# Altium PCB Zotino.PCBDOC (part 1 of 10)
Units mm, origin at the board's own origin, x right, y up, seen from the top; angles counter-clockwise.
Board outline 160.1 x 100.1 mm, 4 copper layers (TopLayer, Internal Plane 2, Signal Layer 1, BottomLayer), stack 1.563 mm thick; 759 components, 378 nets, 2272 pads, 779 vias.
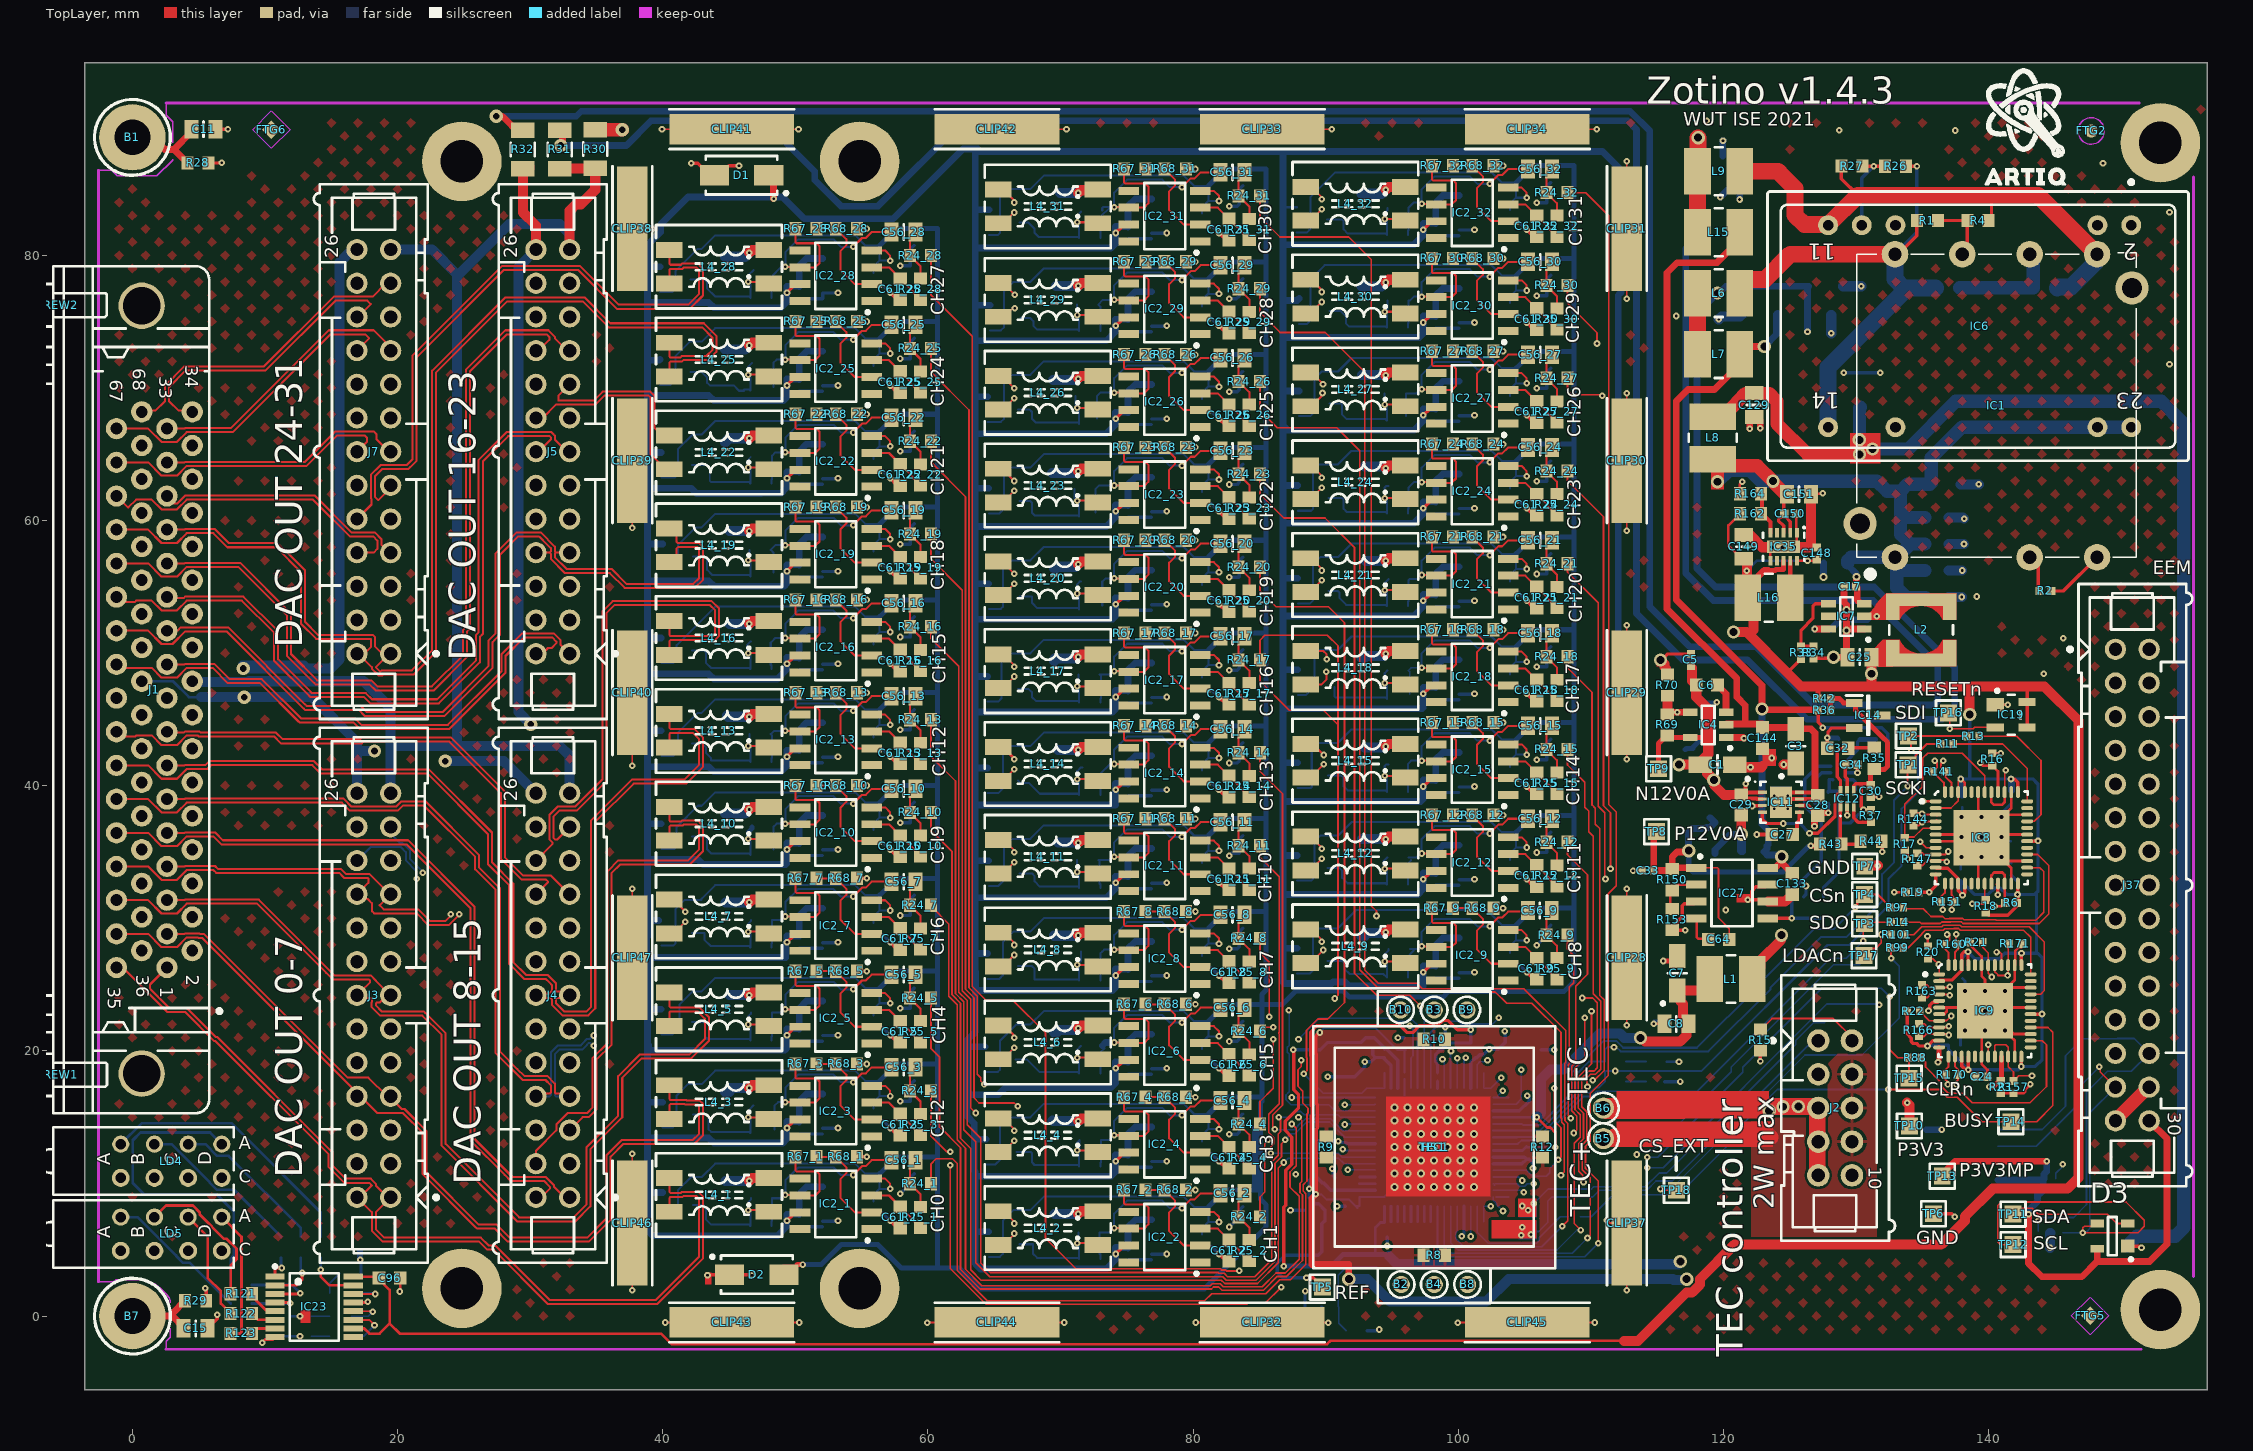
[diagram p0: TopLayer view]
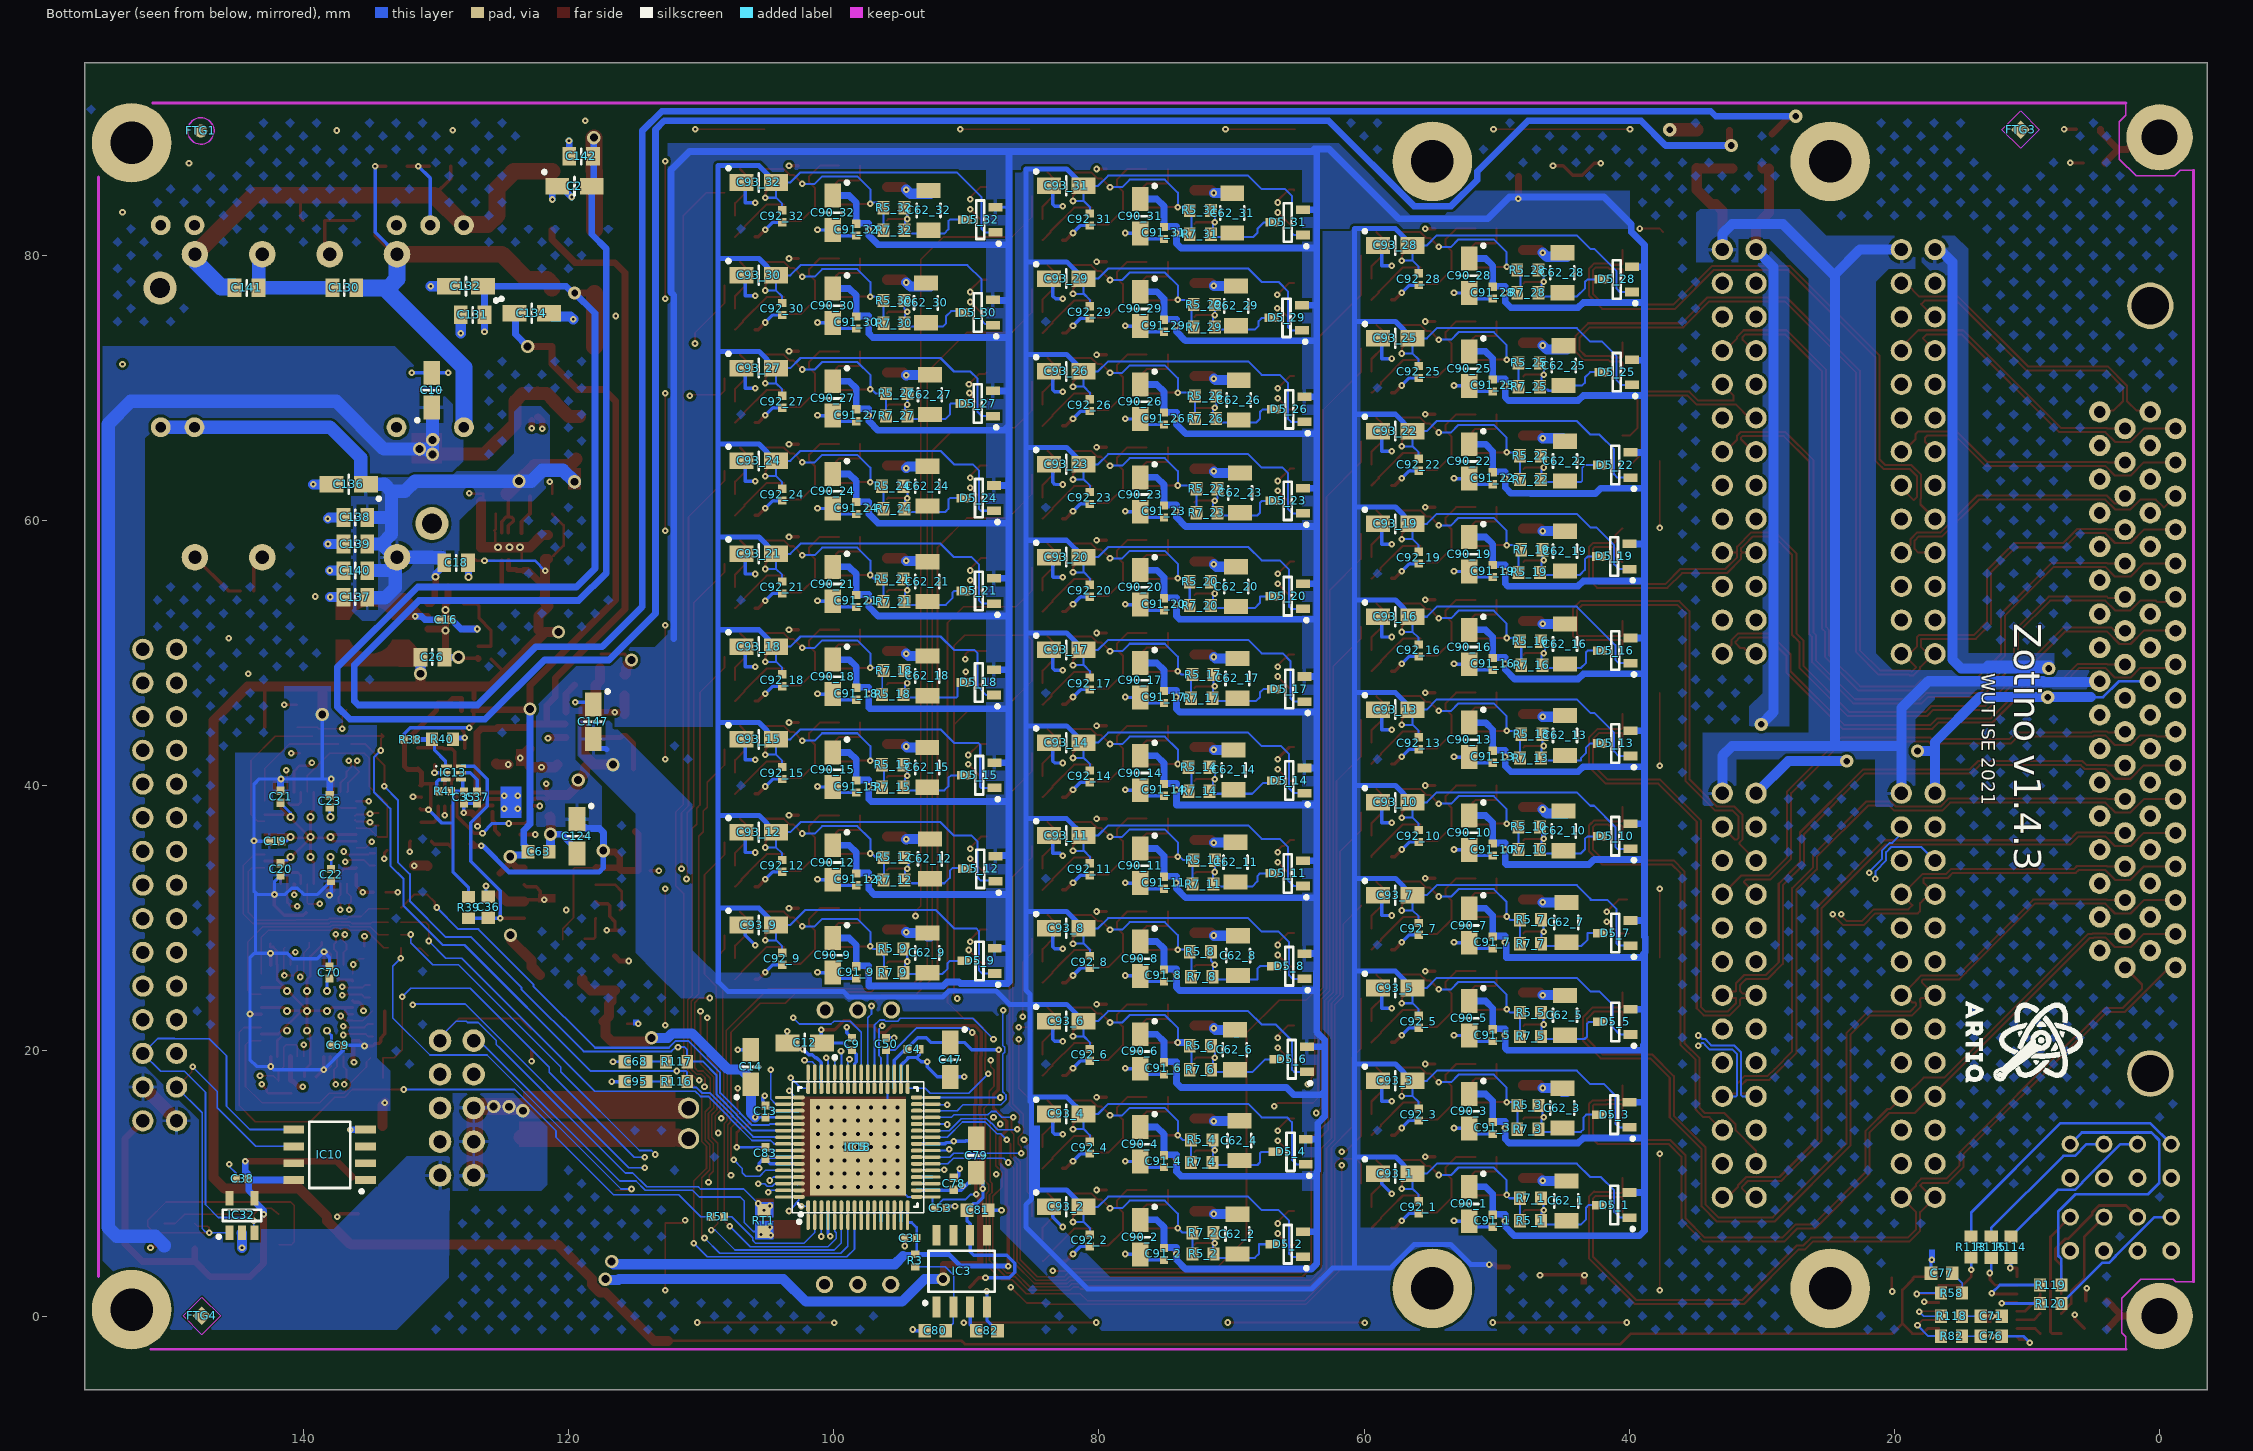
[diagram p1: BottomLayer view, seen from below]
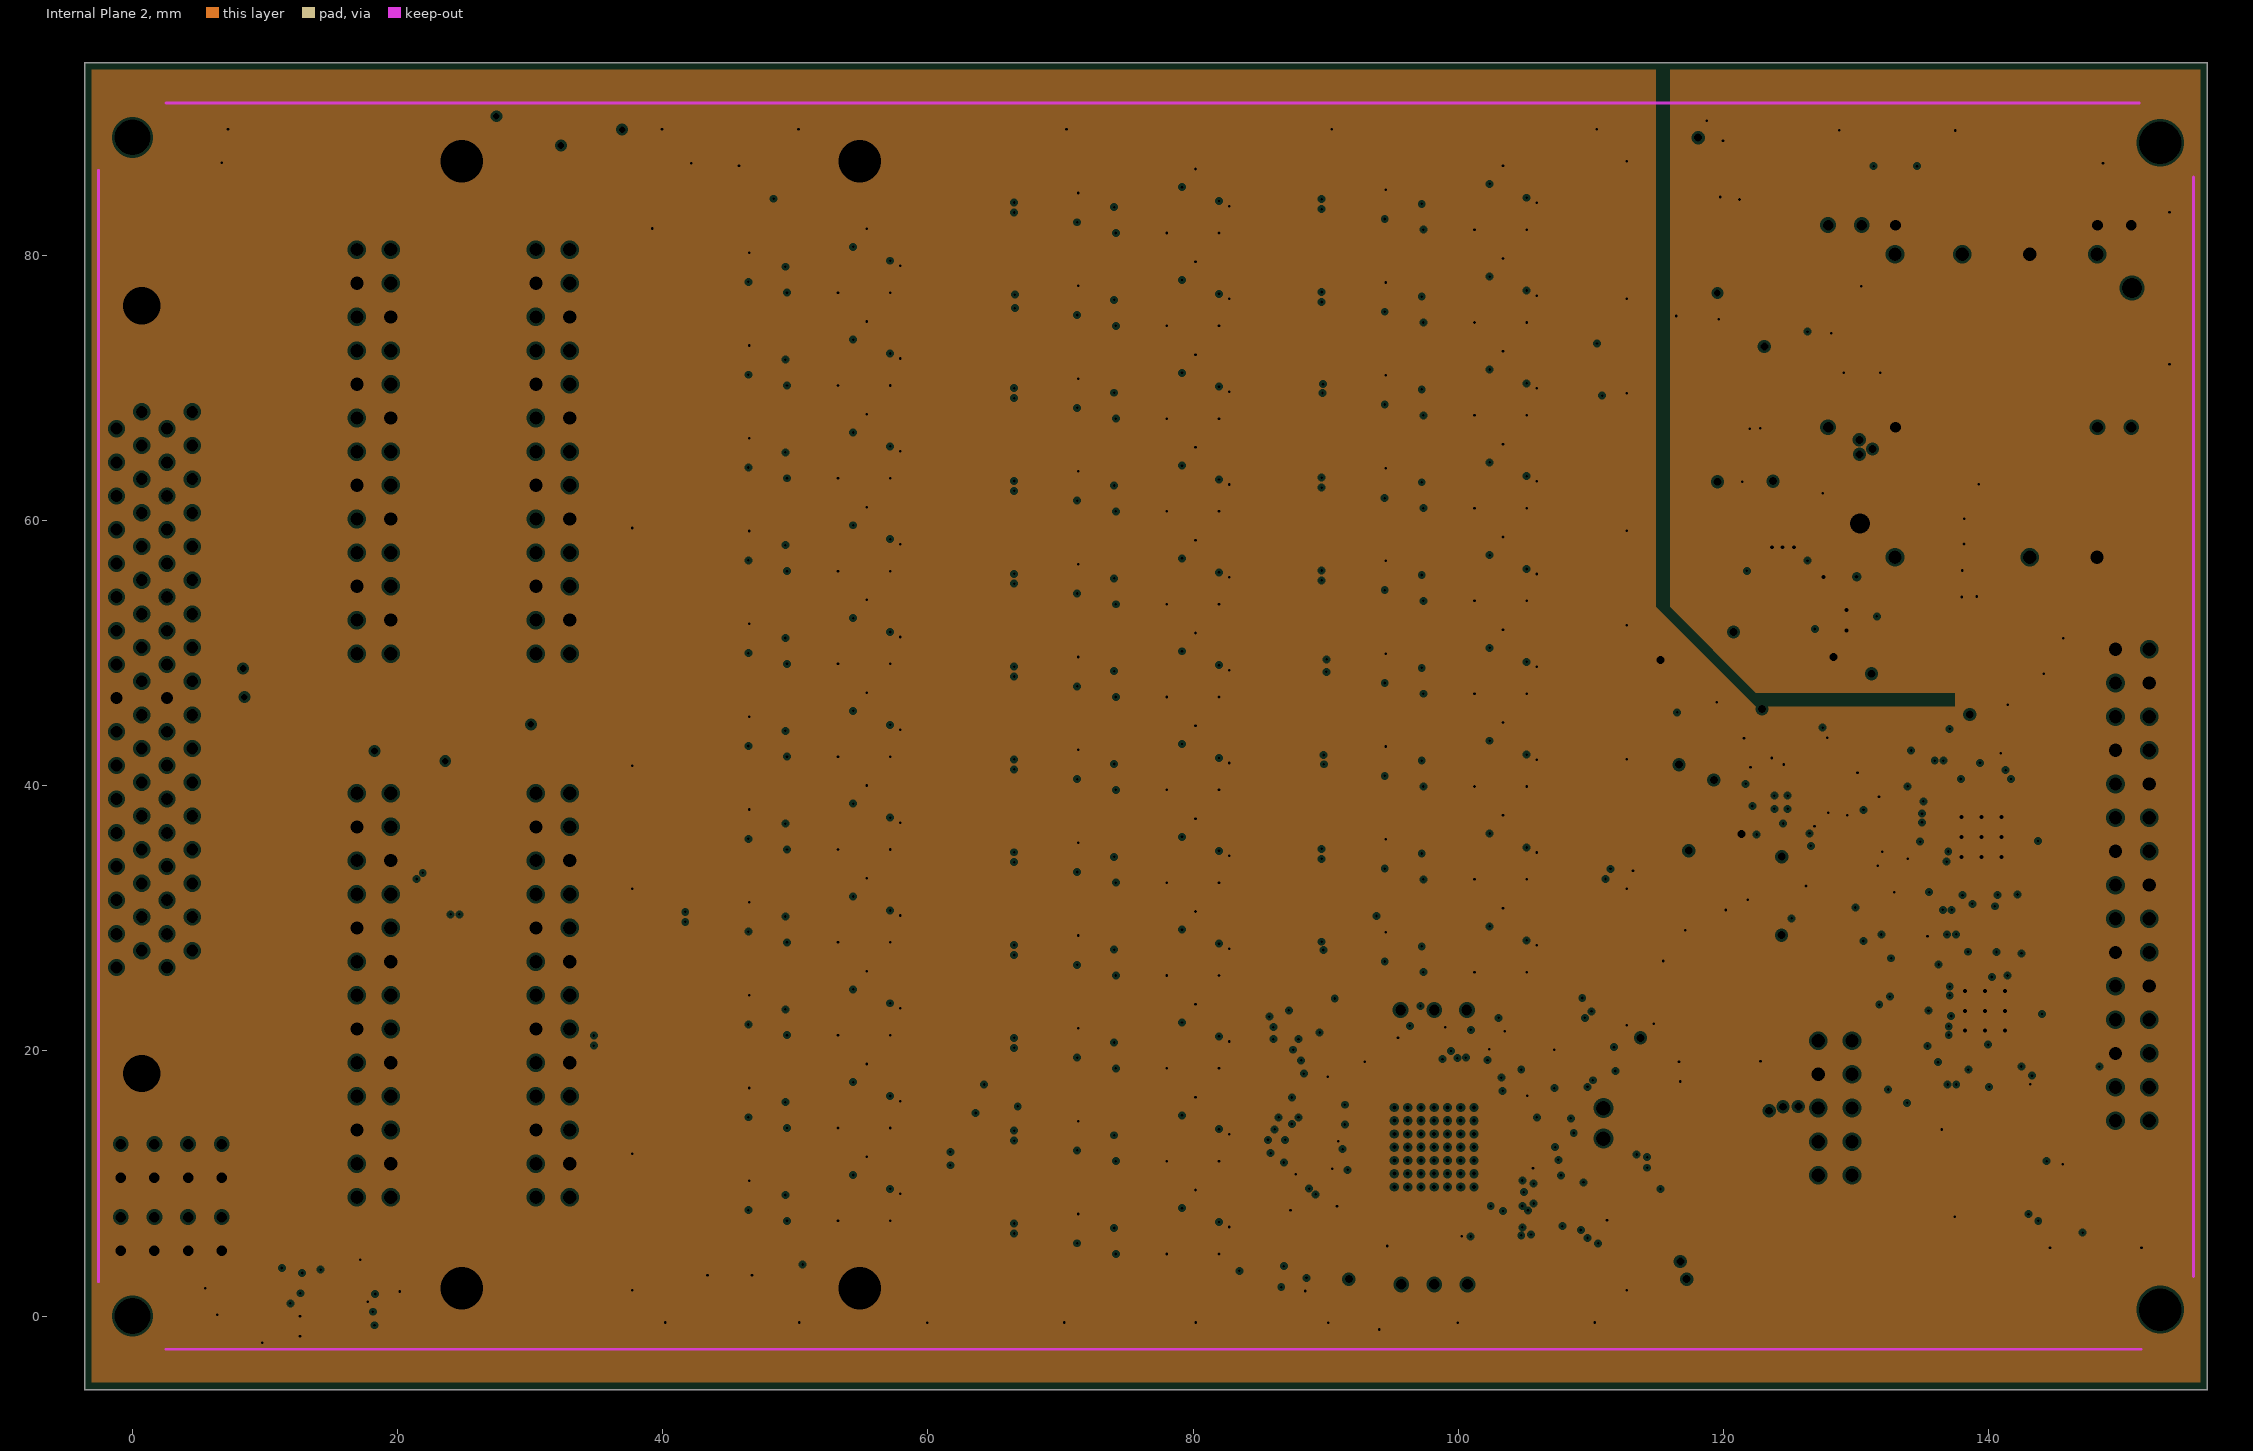
[diagram p2: Internal Plane 2, clearances drawn from the general rule]
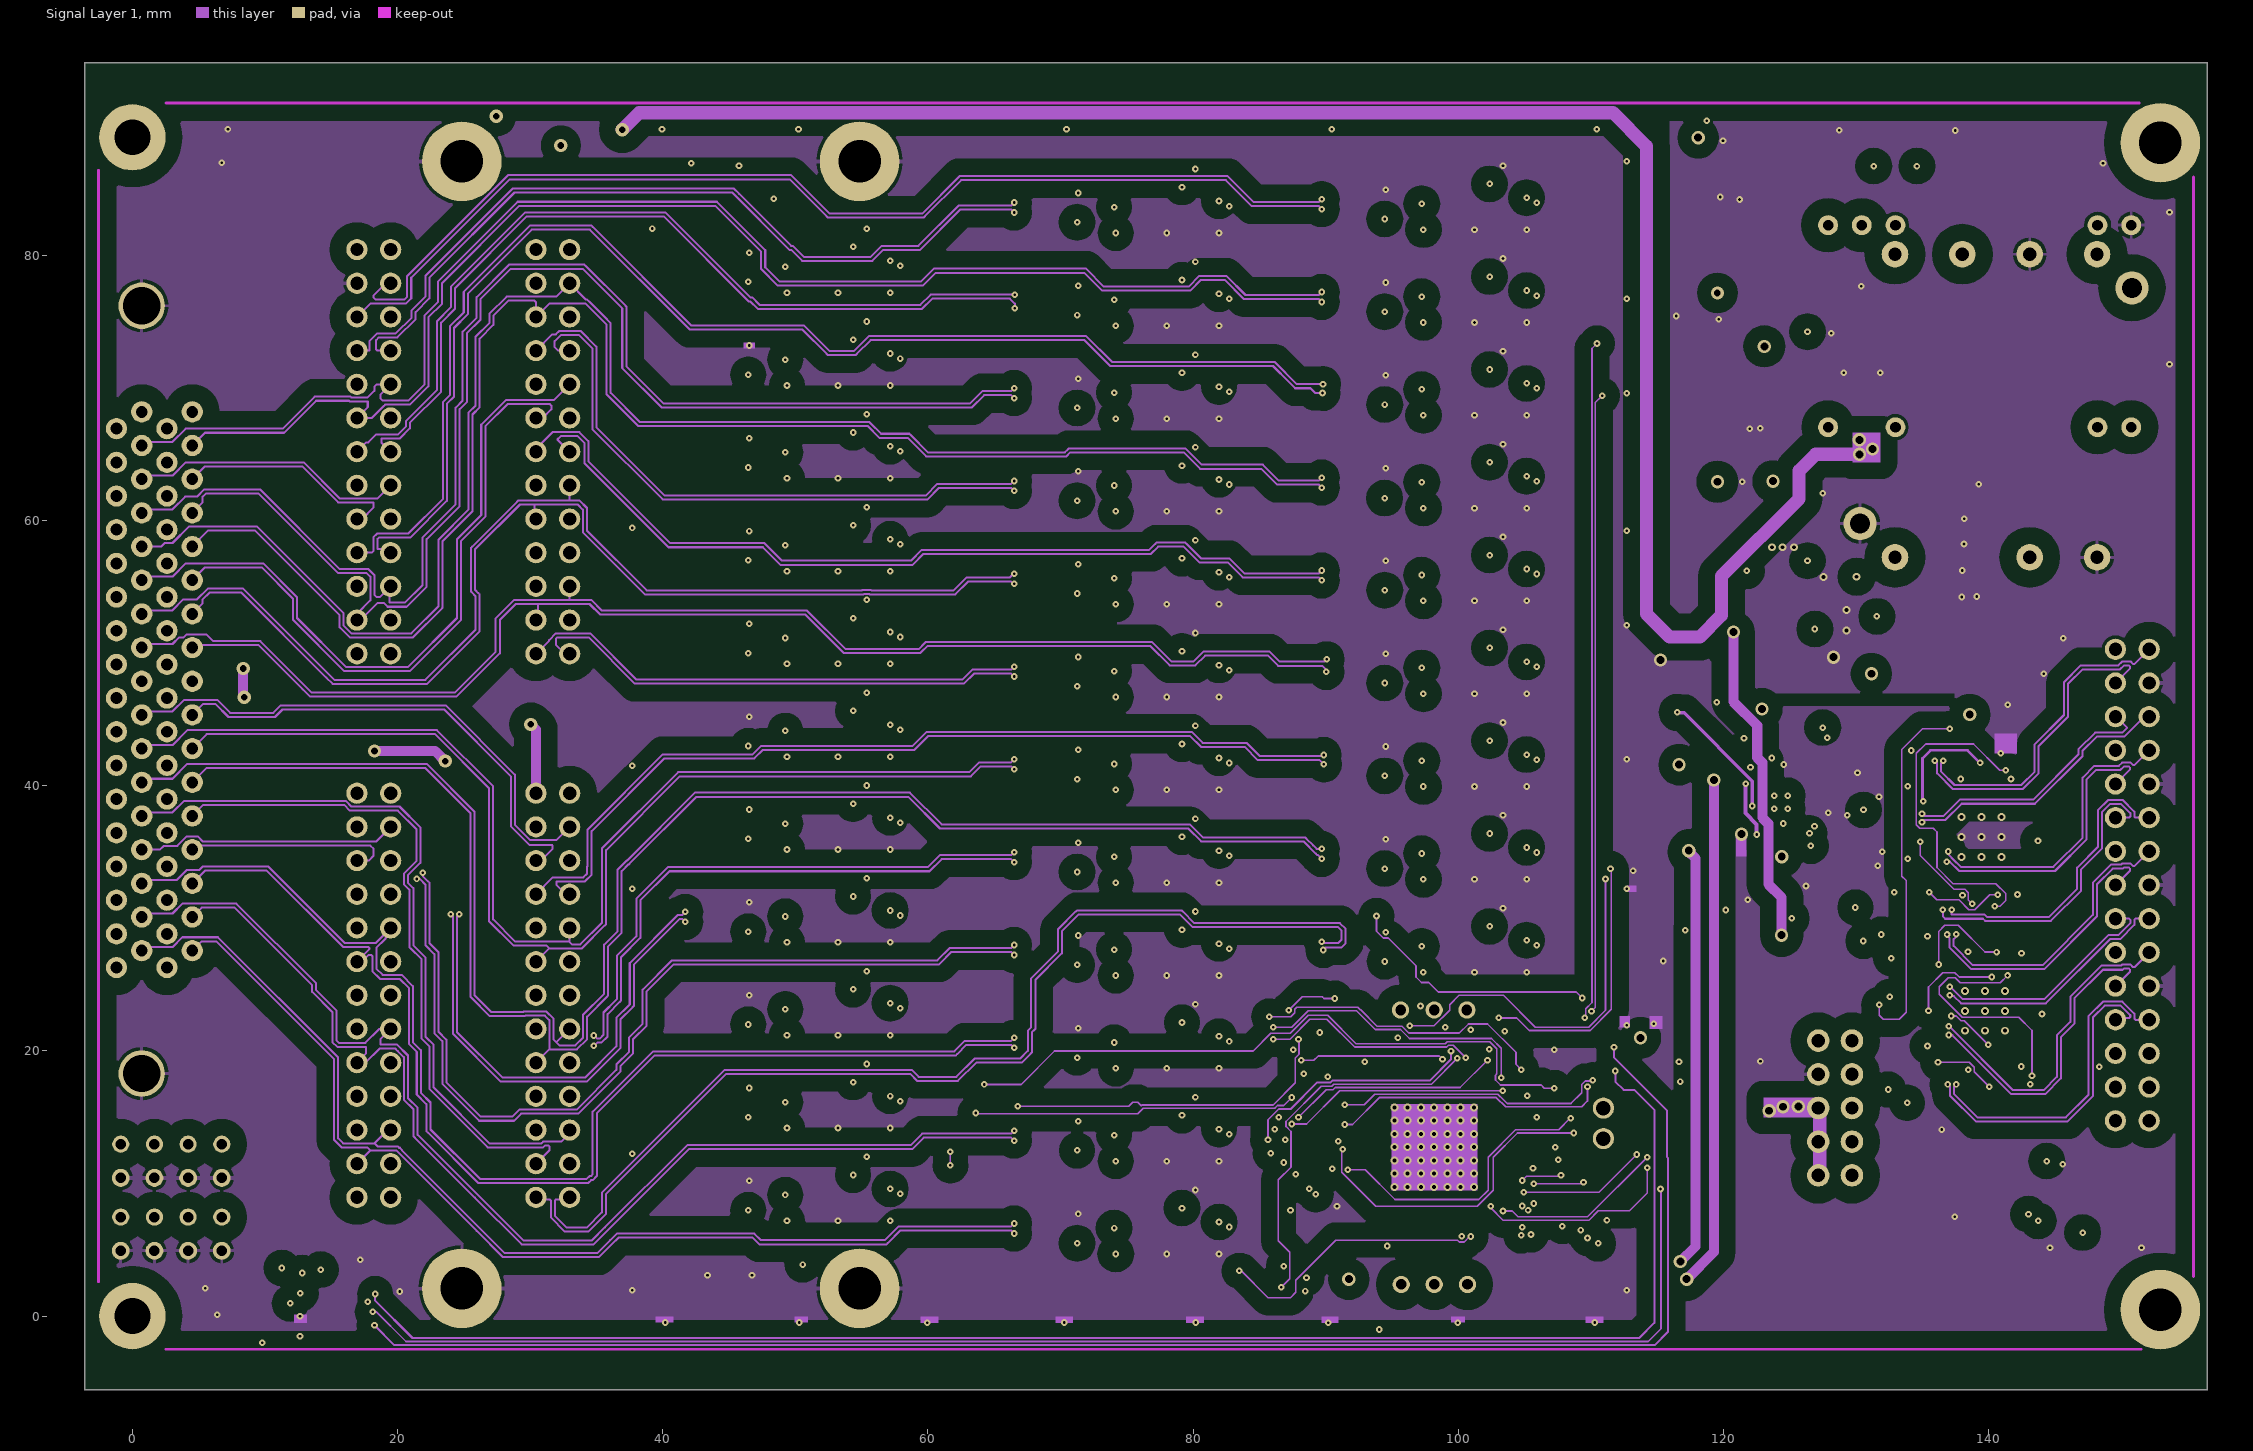
[diagram p3: Signal Layer 1]
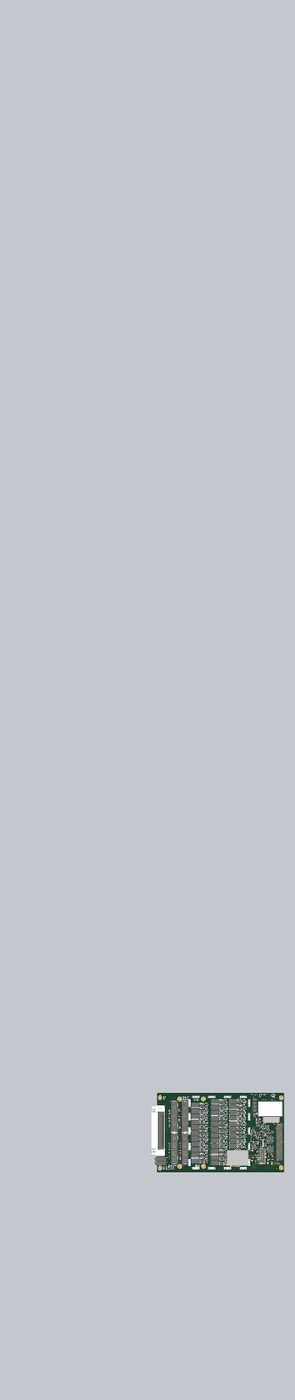
[diagram p11: 3D render of the assembled board from above, using the file's embedded part models]
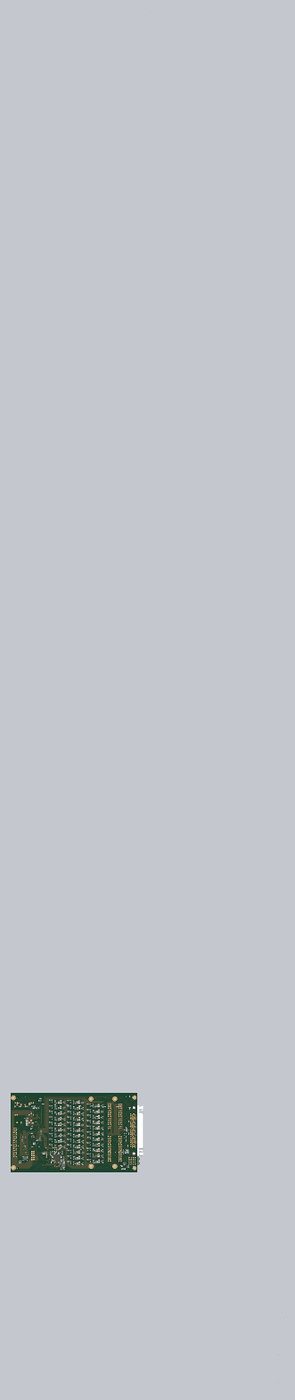
[diagram p12: 3D render of the assembled board from below, using the file's embedded part models]

## Layer stack, top to bottom
TopSolder: solder mask 0.0102, Solder Resist, Dk 3.5
TopLayer: signal copper 0.0356
Dielectric1: core 0.36, FR-4, Dk 4.8
Internal Plane 2: plane copper 0.036, net GND
Dielectric 3: prepreg 0.7, Dk 4.2
Signal Layer 1: signal copper 0.036
Dielectric 5: core 0.36, Dk 4.2
BottomLayer: signal copper 0.0356
BottomSolder: solder mask 0.0102, Solder Resist, Dk 3.5

## Board outline
71.44,-5.562 ccw(c71.444,-5.512) 71.444,-5.562 89.253,-5.562 ccw(c89.253,-5.512) 89.258,-5.562 156.444,-5.562 ccw(c156.444,-5.512) 156.494,-5.512 ccw(c156.444,-5.512) 156.489,-5.489 156.489,44.471 ccw(c156.444,44.494) 156.494,44.494 156.494,94.488 ccw(c156.444,94.488) 156.439,94.538 ccw(c156.439,94.488) 156.439,94.538 -3.556,94.538 ccw(c-3.556,94.488) -3.606,94.488 -3.606,-5.512 ccw(c-3.556,-5.512) -3.556,-5.562

## Design rules (kind name [scope] priority, off if disabled: settings)
AcuteAngle [All] p1: minimum=6.00000000000000E+0001 checktracksonly=FALSE
Clearance Clearance_GND_L3 [InNamedPolygon('GND_L3')] p1: gap=1.27 ignorepadtopadclearanceinfootprint=FALSE except(0.635: Via-Via Via-Fill Via-Poly Via-Region Via-Text Via-Hole)
Clearance Clearance_balancing [InNamedPolygon('balancing')] p2: gap=0.21 ignorepadtopadclearanceinfootprint=FALSE except(0.32: Arc-Fill Arc-Poly Arc-Region Track-Fill Track-Poly Track-Region; 0.6: THPad-Fill THPad-Poly THPad-Region Via-Fill Via-Poly Via-Region Fill-Fill Fill-Poly Fill-Region Poly-Poly Poly-Region Region-Region; 2.3: SMDPad-Fill SMDPad-Poly SMDPad-Region)
Clearance Clearance_DIFF [(InDifferentialPairClass('All Differential Pairs')and IsTrack ) vs (InDifferentialPairClass('All Differential Pairs') and IsTrack  )] p3 off: gap=0.508 ignorepadtopadclearanceinfootprint=FALSE except(0: Arc-Hole Track-Hole SMDPad-Hole THPad-Hole Via-Hole Fill-Hole Poly-Hole Region-Hole Text-Hole; 0.127: SMDPad-SMDPad SMDPad-THPad SMDPad-Via SMDPad-Fill SMDPad-Poly SMDPad-Region SMDPad-Text THPad-THPad THPad-Via THPad-Fill THPad-Poly THPad-Region THPad-Text Via-Via Via-Fill Via-Poly Via-Region Via-Text)
Clearance [All] p4: gap=0.127 ignorepadtopadclearanceinfootprint=FALSE except(0: Arc-Hole Track-Hole SMDPad-Hole THPad-Hole Via-Hole Fill-Hole Poly-Hole Region-Hole Text-Hole; 0.203: Arc-Poly Track-Poly SMDPad-Poly THPad-Poly Via-Poly Fill-Poly Poly-Poly)
ComponentClearance [All] p1: gap=0 collisioncheckmode=3 verticalgap=0 showdistances=FALSE
DiffPairsRouting [All] p1: maxlimit=0.152 minlimit=0.127 mostfreqgap=0.152 toplayer_minwidth=0.127 toplayer_maxwidth=0.152 toplayer_prefwidth=0.152 midlayer1_minwidth=0.127 midlayer1_maxwidth=0.152 midlayer1_prefwidth=0.152 bottomlayer_minwidth=0.127 bottomlayer_maxwidth=0.152 bottomlayer_prefwidth=0.152 maxuncoupledlength=25.4
FabricationTestPointUsage TestPointUsage [All] p1: valid=0 allowmultiple=FALSE
FabricationTestpoint Testpoint [All] p1: side=3 testpointundercomponent=TRUE minsize=1.016 maxsize=2.54 preferedsize=1.524 minholesize=0.508 maxholesize=1.016 preferedholesize=0.813 testpointgrid=0.025 allowsidetop=TRUE allowsidebottom=TRUE usegrid=TRUE gridtolerance=0
Height [All] p1: minheight=0 maxheight=40 prefheight=40
HoleSize [All] p1: absolutevalues=TRUE maxlimit=3.81 minlimit=0.025 maxpercent=80.000 minpercent=20.000
HoleToHoleClearance [All] p1: gap=0.025 allowstackedmicrovias=TRUE
MinimumSolderMaskSliver [All] p1: minsoldermaskwidth=0
PlaneClearance [All] p1: clearance=0.2
PlaneConnect [All] p1: planeconnectstyle=Direct reliefexpansion=0.508 reliefentries=4 reliefconductorwidth=0.254 reliefairgap=0.254
PolygonConnect PolygonConnect_pad [(InPadClass('All Pads'))] p1: connectstyle=Relief reliefconductorwidth=0.254 reliefentries=4 polygonreliefangle="90 Angle" airgapwidth=0.254
PolygonConnect [All] p2: connectstyle=Direct reliefconductorwidth=0.254 reliefentries=4 polygonreliefangle="45 Angle" airgapwidth=0.254
RoomDefinition Zotino [InComponentClass('Zotino')] p1: confinementstyle=ConfineIn formatcopy=TRUE lockcomponents=FALSE outline -105.156,-157.912 -54.356,-157.912 -54.356,-132.512 -105.156,-132.512
RoomDefinition U_Supply_DAC [InComponentClass('U_Supply_DAC')] p2 off: confinementstyle=ConfineIn formatcopy=TRUE lockcomponents=FALSE outline 158.944,50.988 120.444,50.988 120.444,-4.012 158.944,-4.012
RoomDefinition U_LVDS_IFC_DAC [InComponentClass('U_LVDS_IFC_DAC')] p3 off: confinementstyle=ConfineIn formatcopy=TRUE lockcomponents=FALSE outline 119.444,-3.512 156.444,-3.512 156.444,47.488 119.444,47.488
RoomDefinition U_Output_channel1 [InComponentClass('U_Output_channel1')] p4 off: confinementstyle=ConfineIn formatcopy=TRUE lockcomponents=FALSE outline 39.207,5.694 61.407,5.694 61.407,12.694 39.207,12.694
RoomDefinition U_Output_channel2 [InComponentClass('U_Output_channel2')] p5 off: confinementstyle=ConfineIn formatcopy=TRUE lockcomponents=FALSE outline 64.007,3.194 86.207,3.194 86.207,10.194 64.007,10.194
RoomDefinition U_Output_channel3 [InComponentClass('U_Output_channel3')] p6 off: confinementstyle=ConfineIn formatcopy=TRUE lockcomponents=FALSE outline 39.207,12.694 61.407,12.694 61.407,19.694 39.207,19.694
RoomDefinition U_Output_channel4 [InComponentClass('U_Output_channel4')] p7 off: confinementstyle=ConfineIn formatcopy=TRUE lockcomponents=FALSE outline 64.007,10.194 86.207,10.194 86.207,17.194 64.007,17.194
RoomDefinition U_Output_channel5 [InComponentClass('U_Output_channel5')] p8 off: confinementstyle=ConfineIn formatcopy=TRUE lockcomponents=FALSE outline 39.207,19.694 61.407,19.694 61.407,26.694 39.207,26.694
RoomDefinition U_Output_channel6 [InComponentClass('U_Output_channel6')] p9 off: confinementstyle=ConfineIn formatcopy=TRUE lockcomponents=FALSE outline 64.007,17.194 86.207,17.194 86.207,24.194 64.007,24.194
RoomDefinition U_Output_channel7 [InComponentClass('U_Output_channel7')] p10 off: confinementstyle=ConfineIn formatcopy=TRUE lockcomponents=FALSE outline 39.207,26.694 61.407,26.694 61.407,33.694 39.207,33.694
RoomDefinition U_Output_channel8 [InComponentClass('U_Output_channel8')] p11 off: confinementstyle=ConfineIn formatcopy=TRUE lockcomponents=FALSE outline 64.007,24.194 86.207,24.194 86.207,31.194 64.007,31.194
RoomDefinition U_Output_channel9 [InComponentClass('U_Output_channel9')] p12 off: confinementstyle=ConfineIn formatcopy=TRUE lockcomponents=FALSE outline 87.207,24.444 109.407,24.444 109.407,31.444 87.207,31.444
RoomDefinition U_Output_channel10 [InComponentClass('U_Output_channel10')] p13 off: confinementstyle=ConfineIn formatcopy=TRUE lockcomponents=FALSE outline 39.207,33.694 61.407,33.694 61.407,40.694 39.207,40.694
RoomDefinition U_Output_channel11 [InComponentClass('U_Output_channel11')] p14 off: confinementstyle=ConfineIn formatcopy=TRUE lockcomponents=FALSE outline 64.007,31.194 86.207,31.194 86.207,38.194 64.007,38.194
RoomDefinition U_Output_channel12 [InComponentClass('U_Output_channel12')] p15 off: confinementstyle=ConfineIn formatcopy=TRUE lockcomponents=FALSE outline 87.207,31.444 109.407,31.444 109.407,38.444 87.207,38.444
RoomDefinition U_Output_channel13 [InComponentClass('U_Output_channel13')] p16 off: confinementstyle=ConfineIn formatcopy=TRUE lockcomponents=FALSE outline 39.207,40.694 61.407,40.694 61.407,47.694 39.207,47.694
RoomDefinition U_Output_channel14 [InComponentClass('U_Output_channel14')] p17 off: confinementstyle=ConfineIn formatcopy=TRUE lockcomponents=FALSE outline 64.007,38.194 86.207,38.194 86.207,45.194 64.007,45.194
RoomDefinition U_Output_channel15 [InComponentClass('U_Output_channel15')] p18 off: confinementstyle=ConfineIn formatcopy=TRUE lockcomponents=FALSE outline 87.207,38.444 109.407,38.444 109.407,45.444 87.207,45.444
RoomDefinition U_Output_channel16 [InComponentClass('U_Output_channel16')] p19 off: confinementstyle=ConfineIn formatcopy=TRUE lockcomponents=FALSE outline 39.207,47.694 61.407,47.694 61.407,54.694 39.207,54.694
RoomDefinition U_Output_channel17 [InComponentClass('U_Output_channel17')] p20 off: confinementstyle=ConfineIn formatcopy=TRUE lockcomponents=FALSE outline 64.007,45.194 86.207,45.194 86.207,52.194 64.007,52.194
RoomDefinition U_Output_channel18 [InComponentClass('U_Output_channel18')] p21 off: confinementstyle=ConfineIn formatcopy=TRUE lockcomponents=FALSE outline 87.207,45.444 109.407,45.444 109.407,52.444 87.207,52.444
RoomDefinition U_Output_channel19 [InComponentClass('U_Output_channel19')] p22 off: confinementstyle=ConfineIn formatcopy=TRUE lockcomponents=FALSE outline 39.207,54.694 61.407,54.694 61.407,61.694 39.207,61.694
RoomDefinition U_Output_channel20 [InComponentClass('U_Output_channel20')] p23 off: confinementstyle=ConfineIn formatcopy=TRUE lockcomponents=FALSE outline 64.007,52.194 86.207,52.194 86.207,59.194 64.007,59.194
RoomDefinition U_Output_channel22 [InComponentClass('U_Output_channel22')] p24 off: confinementstyle=ConfineIn formatcopy=TRUE lockcomponents=FALSE outline 39.207,61.694 61.407,61.694 61.407,68.694 39.207,68.694
RoomDefinition U_Output_channel23 [InComponentClass('U_Output_channel23')] p25 off: confinementstyle=ConfineIn formatcopy=TRUE lockcomponents=FALSE outline 64.007,59.194 86.207,59.194 86.207,66.194 64.007,66.194
RoomDefinition U_Output_channel24 [InComponentClass('U_Output_channel24')] p26 off: confinementstyle=ConfineIn formatcopy=TRUE lockcomponents=FALSE outline 87.207,59.444 109.407,59.444 109.407,66.444 87.207,66.444
RoomDefinition U_Output_channel25 [InComponentClass('U_Output_channel25')] p27 off: confinementstyle=ConfineIn formatcopy=TRUE lockcomponents=FALSE outline 39.207,68.694 61.407,68.694 61.407,75.694 39.207,75.694
RoomDefinition U_Output_channel26 [InComponentClass('U_Output_channel26')] p28 off: confinementstyle=ConfineIn formatcopy=TRUE lockcomponents=FALSE outline 64.007,66.194 86.207,66.194 86.207,73.194 64.007,73.194
RoomDefinition U_Output_channel27 [InComponentClass('U_Output_channel27')] p29 off: confinementstyle=ConfineIn formatcopy=TRUE lockcomponents=FALSE outline 87.207,66.444 109.407,66.444 109.407,73.444 87.207,73.444
RoomDefinition U_Output_channel28 [InComponentClass('U_Output_channel28')] p30 off: confinementstyle=ConfineIn formatcopy=TRUE lockcomponents=FALSE outline 39.207,75.694 61.407,75.694 61.407,82.694 39.207,82.694
RoomDefinition U_Output_channel29 [InComponentClass('U_Output_channel29')] p31 off: confinementstyle=ConfineIn formatcopy=TRUE lockcomponents=FALSE outline 64.007,73.194 86.207,73.194 86.207,80.194 64.007,80.194
RoomDefinition U_Output_channel30 [InComponentClass('U_Output_channel30')] p32 off: confinementstyle=ConfineIn formatcopy=TRUE lockcomponents=FALSE outline 87.207,73.444 109.407,73.444 109.407,80.444 87.207,80.444
RoomDefinition U_Output_channel31 [InComponentClass('U_Output_channel31')] p33 off: confinementstyle=ConfineIn formatcopy=TRUE lockcomponents=FALSE outline 64.007,80.194 86.207,80.194 86.207,87.194 64.007,87.194
RoomDefinition U_Output_channel32 [InComponentClass('U_Output_channel32')] p34 off: confinementstyle=ConfineIn formatcopy=TRUE lockcomponents=FALSE outline 87.207,80.444 109.407,80.444 109.407,87.444 87.207,87.444
RoomDefinition U_Output_channel21 [InComponentClass('U_Output_channel21')] p35 off: confinementstyle=ConfineIn formatcopy=TRUE lockcomponents=FALSE outline 87.207,52.444 109.407,52.444 109.407,59.444 87.207,59.444
RoomDefinition U_DAC_32CH [InComponentClass('U_DAC_32CH')] p36 off: confinementstyle=ConfineIn formatcopy=TRUE lockcomponents=FALSE outline 109.068,21.59 89.332,21.59 89.332,2.769 109.068,2.769
RoutingVias [All] p1: holewidth=0.2 width=0.5 viastyle="Through Hole" minholewidth=0.2 minwidth=0.5 maxholewidth=0.711 maxwidth=1.27
SilkToSilkClearance [All] p1: silktosilkclearance=0
SilkToSolderMaskClearance SilkscreenOverComponentPads [IsPad] p1: minsilkscreentomaskgap=0 clearancetoexposedcopper=TRUE
SolderMaskExpansion SolderMaskExpansion_VIA [IsVia] p1: expansion=0.102 istentingtop=TRUE
SolderMaskExpansion [All] p2: expansion=0.051 istentingtop=FALSE
ViasUnderSMD [All] p1: allowed=FALSE
Width [All] p1: maxlimit=1.27 minlimit=0.127 preferedwidth=0.127
18 further rules are at their usual default settings.

## Classes and differential pairs
net class DAC_OUT_P[32..1]: DAC_OUT_P1 DAC_OUT_P2 DAC_OUT_P3 DAC_OUT_P4 DAC_OUT_P5 DAC_OUT_P6 DAC_OUT_P7 DAC_OUT_P8 DAC_OUT_P9 DAC_OUT_P10 DAC_OUT_P11 DAC_OUT_P12 DAC_OUT_P13 DAC_OUT_P14 DAC_OUT_P15 DAC_OUT_P16 DAC_OUT_P17 DAC_OUT_P18 DAC_OUT_P19 DAC_OUT_P20 DAC_OUT_P21 DAC_OUT_P22 DAC_OUT_P23 DAC_OUT_P24 DAC_OUT_P25 DAC_OUT_P26 DAC_OUT_P27 DAC_OUT_P28 DAC_OUT_P29 DAC_OUT_P30 DAC_OUT_P31 DAC_OUT_P32
net class DAC_OUT_N[32..1]: DAC_OUT_N1 DAC_OUT_N2 DAC_OUT_N3 DAC_OUT_N4 DAC_OUT_N5 DAC_OUT_N6 DAC_OUT_N7 DAC_OUT_N8 DAC_OUT_N9 DAC_OUT_N10 DAC_OUT_N11 DAC_OUT_N12 DAC_OUT_N13 DAC_OUT_N14 DAC_OUT_N15 DAC_OUT_N16 DAC_OUT_N17 DAC_OUT_N18 DAC_OUT_N19 DAC_OUT_N20 DAC_OUT_N21 DAC_OUT_N22 DAC_OUT_N23 DAC_OUT_N24 DAC_OUT_N25 DAC_OUT_N26 DAC_OUT_N27 DAC_OUT_N28 DAC_OUT_N29 DAC_OUT_N30 DAC_OUT_N31 DAC_OUT_N32
net class VOUT[32..1]: VOUT1 VOUT2 VOUT3 VOUT4 VOUT5 VOUT6 VOUT7 VOUT8 VOUT9 VOUT10 VOUT11 VOUT12 VOUT13 VOUT14 VOUT15 VOUT16 VOUT17 VOUT18 VOUT19 VOUT20 VOUT21 VOUT22 VOUT23 VOUT24 VOUT25 VOUT26 VOUT27 VOUT28 VOUT29 VOUT30 VOUT31 VOUT32
component class U_LVDS_IFC_DAC: C19 C20 C21 C22 C23 C24 C38 C69 C70 D3 IC8 IC9 IC10 IC32 J37 R6 R11 R13 R14 R16 R17 R18 R19 R20 R21 R22 R23 R51 R88 R97 R99 R101 R141 R144 R147 R151 R157 R160 R163 R166 R170 R171 TP11 TP12 TP13 TP14
component class Zotino: B1 B2 B3 B4 B5 B6 B7 B8 B9 B10 B? C11 C15 C68 C71 C95 C96 CLIP28 CLIP29 CLIP30 CLIP31 CLIP32 CLIP33 CLIP34 CLIP37 CLIP38 CLIP39 CLIP40 CLIP41 CLIP42 CLIP43 CLIP44 CLIP45 CLIP46 CLIP47 FTG1 FTG2 FTG3 FTG4 FTG5 FTG6 HS1 IC19 IC23 J1 J2 J3 J4 J5 J7 LD1 LD4 LD5 R8 R9 R10 R12 R15 R28 R29 R45 R113 R114 R115 R116 R117 R118 R119 R120 R121 R122 R123 RT1 SCREW1 SCREW2 TEC1 TP18
component class U_DAC_32CH: C1 C7 C8 C9 C12 C13 C14 C31 C33 C47 C50 C53 C76 C77 C78 C79 C80 C81 C82 C83 IC3 IC5 IC18 L1 R3 R58 R82 TP1 TP2 TP3 TP4 TP5 TP15 TP16 TP17
component class U_Supply_DAC: C2 C3 C4 C5 C6 C10 C16 C17 C18 C25 C26 C27 C28 C29 C30 C32 C34 C35 C36 C37 C63 C64 C124 C129 C130 C131 C132 C133 C134 C136 C137 C138 C139 C140 C141 C142 C144 C147 C148 C149 C150 C151 D1 D2 IC1 IC4 IC6 IC7 IC11 IC12 IC13 IC14 IC27 IC35 L2 L6 L7 L8 L9 L15 L16 R1 R2 R4 R26 R27 R30 R31 R32 R33 R34 R35 R36 R37 R38 R39 R40 R41 R42 R43 R44 R69 R70 R150 R153 R162 R164 TP6 TP7 TP8 TP9 TP10
channel class Output_channel: U_Output_channel1 U_Output_channel2 U_Output_channel3 U_Output_channel4 U_Output_channel5 U_Output_channel6 U_Output_channel7 U_Output_channel8 U_Output_channel9 U_Output_channel10 U_Output_channel11 U_Output_channel12 U_Output_channel13 U_Output_channel14 U_Output_channel15 U_Output_channel16 U_Output_channel17 U_Output_channel18 U_Output_channel19 U_Output_channel20 U_Output_channel21 U_Output_channel22 U_Output_channel23 U_Output_channel24 U_Output_channel25 U_Output_channel26 U_Output_channel27 U_Output_channel28 U_Output_channel29 U_Output_channel30 U_Output_channel31 U_Output_channel32
component class U_Output_channel32: C56_32 C61_32 C62_32 C90_32 C91_32 C92_32 C93_32 D5_32 IC2_32 L4_32 R5_32 R7_32 R24_32 R25_32 R67_32 R68_32
component class U_Output_channel31: C56_31 C61_31 C62_31 C90_31 C91_31 C92_31 C93_31 D5_31 IC2_31 L4_31 R5_31 R7_31 R24_31 R25_31 R67_31 R68_31
component class U_Output_channel30: C56_30 C61_30 C62_30 C90_30 C91_30 C92_30 C93_30 D5_30 IC2_30 L4_30 R5_30 R7_30 R24_30 R25_30 R67_30 R68_30
component class U_Output_channel29: C56_29 C61_29 C62_29 C90_29 C91_29 C92_29 C93_29 D5_29 IC2_29 L4_29 R5_29 R7_29 R24_29 R25_29 R67_29 R68_29
component class U_Output_channel28: C56_28 C61_28 C62_28 C90_28 C91_28 C92_28 C93_28 D5_28 IC2_28 L4_28 R5_28 R7_28 R24_28 R25_28 R67_28 R68_28
component class U_Output_channel27: C56_27 C61_27 C62_27 C90_27 C91_27 C92_27 C93_27 D5_27 IC2_27 L4_27 R5_27 R7_27 R24_27 R25_27 R67_27 R68_27
component class U_Output_channel26: C56_26 C61_26 C62_26 C90_26 C91_26 C92_26 C93_26 D5_26 IC2_26 L4_26 R5_26 R7_26 R24_26 R25_26 R67_26 R68_26
component class U_Output_channel25: C56_25 C61_25 C62_25 C90_25 C91_25 C92_25 C93_25 D5_25 IC2_25 L4_25 R5_25 R7_25 R24_25 R25_25 R67_25 R68_25
component class U_Output_channel24: C56_24 C61_24 C62_24 C90_24 C91_24 C92_24 C93_24 D5_24 IC2_24 L4_24 R5_24 R7_24 R24_24 R25_24 R67_24 R68_24
component class U_Output_channel23: C56_23 C61_23 C62_23 C90_23 C91_23 C92_23 C93_23 D5_23 IC2_23 L4_23 R5_23 R7_23 R24_23 R25_23 R67_23 R68_23
component class U_Output_channel22: C56_22 C61_22 C62_22 C90_22 C91_22 C92_22 C93_22 D5_22 IC2_22 L4_22 R5_22 R7_22 R24_22 R25_22 R67_22 R68_22
component class U_Output_channel21: C56_21 C61_21 C62_21 C90_21 C91_21 C92_21 C93_21 D5_21 IC2_21 L4_21 R5_21 R7_21 R24_21 R25_21 R67_21 R68_21
component class U_Output_channel20: C56_20 C61_20 C62_20 C90_20 C91_20 C92_20 C93_20 D5_20 IC2_20 L4_20 R5_20 R7_20 R24_20 R25_20 R67_20 R68_20
component class U_Output_channel19: C56_19 C61_19 C62_19 C90_19 C91_19 C92_19 C93_19 D5_19 IC2_19 L4_19 R5_19 R7_19 R24_19 R25_19 R67_19 R68_19
component class U_Output_channel18: C56_18 C61_18 C62_18 C90_18 C91_18 C92_18 C93_18 D5_18 IC2_18 L4_18 R5_18 R7_18 R24_18 R25_18 R67_18 R68_18
component class U_Output_channel17: C56_17 C61_17 C62_17 C90_17 C91_17 C92_17 C93_17 D5_17 IC2_17 L4_17 R5_17 R7_17 R24_17 R25_17 R67_17 R68_17
component class U_Output_channel16: C56_16 C61_16 C62_16 C90_16 C91_16 C92_16 C93_16 D5_16 IC2_16 L4_16 R5_16 R7_16 R24_16 R25_16 R67_16 R68_16
component class U_Output_channel15: C56_15 C61_15 C62_15 C90_15 C91_15 C92_15 C93_15 D5_15 IC2_15 L4_15 R5_15 R7_15 R24_15 R25_15 R67_15 R68_15
component class U_Output_channel14: C56_14 C61_14 C62_14 C90_14 C91_14 C92_14 C93_14 D5_14 IC2_14 L4_14 R5_14 R7_14 R24_14 R25_14 R67_14 R68_14
component class U_Output_channel13: C56_13 C61_13 C62_13 C90_13 C91_13 C92_13 C93_13 D5_13 IC2_13 L4_13 R5_13 R7_13 R24_13 R25_13 R67_13 R68_13
component class U_Output_channel12: C56_12 C61_12 C62_12 C90_12 C91_12 C92_12 C93_12 D5_12 IC2_12 L4_12 R5_12 R7_12 R24_12 R25_12 R67_12 R68_12
component class U_Output_channel11: C56_11 C61_11 C62_11 C90_11 C91_11 C92_11 C93_11 D5_11 IC2_11 L4_11 R5_11 R7_11 R24_11 R25_11 R67_11 R68_11
component class U_Output_channel10: C56_10 C61_10 C62_10 C90_10 C91_10 C92_10 C93_10 D5_10 IC2_10 L4_10 R5_10 R7_10 R24_10 R25_10 R67_10 R68_10
component class U_Output_channel9: C56_9 C61_9 C62_9 C90_9 C91_9 C92_9 C93_9 D5_9 IC2_9 L4_9 R5_9 R7_9 R24_9 R25_9 R67_9 R68_9
component class U_Output_channel8: C56_8 C61_8 C62_8 C90_8 C91_8 C92_8 C93_8 D5_8 IC2_8 L4_8 R5_8 R7_8 R24_8 R25_8 R67_8 R68_8
component class U_Output_channel7: C56_7 C61_7 C62_7 C90_7 C91_7 C92_7 C93_7 D5_7 IC2_7 L4_7 R5_7 R7_7 R24_7 R25_7 R67_7 R68_7
component class U_Output_channel6: C56_6 C61_6 C62_6 C90_6 C91_6 C92_6 C93_6 D5_6 IC2_6 L4_6 R5_6 R7_6 R24_6 R25_6 R67_6 R68_6
component class U_Output_channel5: C56_5 C61_5 C62_5 C90_5 C91_5 C92_5 C93_5 D5_5 IC2_5 L4_5 R5_5 R7_5 R24_5 R25_5 R67_5 R68_5
component class U_Output_channel4: C56_4 C61_4 C62_4 C90_4 C91_4 C92_4 C93_4 D5_4 IC2_4 L4_4 R5_4 R7_4 R24_4 R25_4 R67_4 R68_4
component class U_Output_channel3: C56_3 C61_3 C62_3 C90_3 C91_3 C92_3 C93_3 D5_3 IC2_3 L4_3 R5_3 R7_3 R24_3 R25_3 R67_3 R68_3
component class U_Output_channel2: C56_2 C61_2 C62_2 C90_2 C91_2 C92_2 C93_2 D5_2 IC2_2 L4_2 R5_2 R7_2 R24_2 R25_2 R67_2 R68_2
component class U_Output_channel1: C56_1 C61_1 C62_1 C90_1 C91_1 C92_1 C93_1 D5_1 IC2_1 L4_1 R5_1 R7_1 R24_1 R25_1 R67_1 R68_1
differential pair LVDS7: +LVDS6_P -LVDS6_N
differential pair LVDS6: +LVDS5_P -LVDS5_N
differential pair LVDS5: +LVDS4_P -LVDS4_N
differential pair LVDS4: +LVDS3_P -LVDS3_N
differential pair LVDS3: +LVDS2_P -LVDS2_N
differential pair LVDS2: +LVDS1_P -LVDS1_N
differential pair DAC_OUT1: +DAC_OUT_P1 -DAC_OUT_N1
differential pair DAC_OUT2: +DAC_OUT_P2 -DAC_OUT_N2
differential pair DAC_OUT3: +DAC_OUT_P3 -DAC_OUT_N3
differential pair DAC_OUT4: +DAC_OUT_P4 -DAC_OUT_N4
differential pair DAC_OUT5: +DAC_OUT_P5 -DAC_OUT_N5
differential pair DAC_OUT6: +DAC_OUT_P6 -DAC_OUT_N6
differential pair DAC_OUT7: +DAC_OUT_P7 -DAC_OUT_N7
differential pair DAC_OUT8: +DAC_OUT_P8 -DAC_OUT_N8
differential pair DAC_OUT9: +DAC_OUT_P9 -DAC_OUT_N9
differential pair DAC_OUT10: +DAC_OUT_P10 -DAC_OUT_N10
differential pair DAC_OUT11: +DAC_OUT_P11 -DAC_OUT_N11
differential pair DAC_OUT12: +DAC_OUT_P12 -DAC_OUT_N12
differential pair DAC_OUT13: +DAC_OUT_P13 -DAC_OUT_N13
differential pair DAC_OUT14: +DAC_OUT_P14 -DAC_OUT_N14
differential pair DAC_OUT15: +DAC_OUT_P15 -DAC_OUT_N15
differential pair DAC_OUT16: +DAC_OUT_P16 -DAC_OUT_N16
differential pair DAC_OUT17: +DAC_OUT_P17 -DAC_OUT_N17
differential pair DAC_OUT18: +DAC_OUT_P18 -DAC_OUT_N18
differential pair DAC_OUT19: +DAC_OUT_P19 -DAC_OUT_N19
differential pair DAC_OUT20: +DAC_OUT_P20 -DAC_OUT_N20
differential pair DAC_OUT21: +DAC_OUT_P21 -DAC_OUT_N21
differential pair DAC_OUT22: +DAC_OUT_P22 -DAC_OUT_N22
differential pair DAC_OUT23: +DAC_OUT_P23 -DAC_OUT_N23
differential pair DAC_OUT24: +DAC_OUT_P24 -DAC_OUT_N24
differential pair DAC_OUT25: +DAC_OUT_P25 -DAC_OUT_N25
differential pair DAC_OUT26: +DAC_OUT_P26 -DAC_OUT_N26
differential pair DAC_OUT27: +DAC_OUT_P27 -DAC_OUT_N27
differential pair DAC_OUT28: +DAC_OUT_P28 -DAC_OUT_N28
differential pair DAC_OUT29: +DAC_OUT_P29 -DAC_OUT_N29
differential pair DAC_OUT30: +DAC_OUT_P30 -DAC_OUT_N30
differential pair DAC_OUT31: +DAC_OUT_P31 -DAC_OUT_N31
differential pair DAC_OUT32: +DAC_OUT_P32 -DAC_OUT_N32
differential pair LVDS0: +LVDS0_P -LVDS0_N
differential pair LVDS7: +LVDS7_P -LVDS7_N

## Components (designator, comment, footprint, x,y, rotation, side; value= is the part's Value field where it differs from the comment)
B1 "Plated Hole" MTG270_500 0,88.9 r0 top
B2 "Plated Hole" c130h80 95.694,2.388 r0 top locked
B3 "Plated Hole" c130h80 98.181,23.088 r0 top locked
B4 "Plated Hole" c130h80 98.181,2.388 r0 top locked
B5 "Plated Hole" c160h110 110.944,13.388 r0 top
B6 "Plated Hole" c160h110 110.944,15.688 r0 top
B7 "Plated Hole" MTG270_500 0,0 r0 top
B8 "Plated Hole" c130h80 100.694,2.388 r180 top locked
B9 "Plated Hole" c130h80 100.644,23.088 r180 top locked
B10 "Plated Hole" c130h80 95.644,23.088 r0 top locked
C1 "10uF" CAPMP3216X180N 119.544,41.588 r180 top
C2 "10uF" CAPMP3216X180N 119.544,85.21 r180 bottom
C3 "10uF" CAPMP3216X180N 125.444,42.988 r90 top
C4 "100nF" CAPC1005X55N 93.987,20.121 r0 bottom
C5 "100nF" CAPC1005X55N 117.544,49.488 r270 top
C6 "10nF" CAPC1608X87N 118.744,47.588 r0 top
C7 "10uF" CAPMP3216X180N 116.504,25.854 r90 top
C8 "22uF" CAPC2012X135N 116.444,22.038 r0 top
C9 "100nF" CAPC1005X55N 98.611,20.519 r270 bottom
C10 "10uF" CAPMP3216X180N 130.319,69.837 r90 bottom
C11 "Undefined" CAPC2012X135N 5.365,89.519 r0 top
C12 "10uF" CAPMP3216X180N 102.188,20.598 r0 bottom
C13 "100nF" CAPC1005X55N 105.15,15.439 r270 bottom
C14 "10uF" CAPMP3216X180N 106.244,18.788 r90 bottom
C15 "Undefined" CAPC2012X135N 4.768,-0.931 r0 top
C16 "100nF" CAPC1005X55N 129.27,52.525 r0 bottom
C17 "100nF" CAPC1005X55N 129.534,55.017 r0 top
C18 "22uF" CAPC2012X135N 128.47,56.804 r0 bottom
C19 "100nF" CAPC1005X55N 142.117,35.811 r0 bottom
C20 "100nF" CAPC1005X55N 141.71,33.703 r270 bottom
C21 "100nF" CAPC1005X55N 141.71,39.164 r90 bottom
C22 "100nF" CAPC1005X55N 137.9,33.271 r270 bottom
C23 "100nF" CAPC1005X55N 138.002,38.834 r90 bottom
C24 "100nF" CAPC1005X55N 139.46,18.043 r180 top
C25 "22uF" CAPC2012X135N 130.261,49.7 r0 top
C26 "22uF" CAPC2012X135N 130.261,49.7 r0 bottom
C27 "10nF" CAPC1608X87N 124.431,36.319 r0 top
C28 "10uF" CAPC1608X80N 127.103,38.514 r90 top
C29 "10uF" CAPC1608X80N 121.332,38.553 r90 top
C30 "100nF" CAPC1005X55N 131.104,39.592 r90 top
C31 "100nF" CAPC1005X55N 94.209,5.888 r180 bottom
C32 "82pF" CAPC1608X87N 128.616,42.817 r0 top
C33 "100nF" CAPC1005X55N 114.278,33.599 r0 top
C34 "100nF" CAPC1005X55N 129.641,41.578 r180 top
C35 "100nF" CAPC1005X55N 127.889,39.118 r90 bottom
C36 "82pF" CAPC1608X87N 126.042,30.831 r270 bottom
C37 "100nF" CAPC1005X55N 126.894,39.118 r90 bottom
C38 "100nF" CAPC1005X55N 144.615,10.348 r180 bottom
C47 "10uF" CAPMP3216X180N 91.194,19.339 r270 bottom
C50 "100nF" CAPC1005X55N 96.044,20.519 r270 bottom
C53 "100nF" CAPC1005X55N 91.944,8.143 r0 bottom
C56_1 "680pF" CAPC2012X135N 58.166,11.76 r180 top (schematic designator C56)
C56_2 "680pF" CAPC2012X135N 82.966,9.26 r180 top (schematic designator C56)
C56_3 "680pF" CAPC2012X135N 58.166,18.76 r180 top (schematic designator C56)
C56_4 "680pF" CAPC2012X135N 82.966,16.26 r180 top (schematic designator C56)
C56_5 "680pF" CAPC2012X135N 58.166,25.76 r180 top (schematic designator C56)
C56_6 "680pF" CAPC2012X135N 82.966,23.26 r180 top (schematic designator C56)
C56_7 "680pF" CAPC2012X135N 58.166,32.76 r180 top (schematic designator C56)
C56_8 "680pF" CAPC2012X135N 82.966,30.26 r180 top (schematic designator C56)
C56_9 "680pF" CAPC2012X135N 106.144,30.588 r180 top (schematic designator C56)
C56_10 "680pF" CAPC2012X135N 58.166,39.76 r180 top (schematic designator C56)
C56_11 "680pF" CAPC2012X135N 82.966,37.26 r180 top (schematic designator C56)
C56_12 "680pF" CAPC2012X135N 106.166,37.51 r180 top (schematic designator C56)
C56_13 "680pF" CAPC2012X135N 58.166,46.76 r180 top (schematic designator C56)
C56_14 "680pF" CAPC2012X135N 82.966,44.26 r180 top (schematic designator C56)
C56_15 "680pF" CAPC2012X135N 106.166,44.51 r180 top (schematic designator C56)
C56_16 "680pF" CAPC2012X135N 58.166,53.76 r180 top (schematic designator C56)
C56_17 "680pF" CAPC2012X135N 82.966,51.26 r180 top (schematic designator C56)
C56_18 "680pF" CAPC2012X135N 106.166,51.51 r180 top (schematic designator C56)
C56_19 "680pF" CAPC2012X135N 58.166,60.76 r180 top (schematic designator C56)
C56_20 "680pF" CAPC2012X135N 82.966,58.26 r180 top (schematic designator C56)
C56_21 "680pF" CAPC2012X135N 106.166,58.51 r180 top (schematic designator C56)
C56_22 "680pF" CAPC2012X135N 58.166,67.76 r180 top (schematic designator C56)
C56_23 "680pF" CAPC2012X135N 82.966,65.26 r180 top (schematic designator C56)
C56_24 "680pF" CAPC2012X135N 106.166,65.51 r180 top (schematic designator C56)
C56_25 "680pF" CAPC2012X135N 58.166,74.76 r180 top (schematic designator C56)
C56_26 "680pF" CAPC2012X135N 82.966,72.26 r180 top (schematic designator C56)
C56_27 "680pF" CAPC2012X135N 106.166,72.51 r180 top (schematic designator C56)
C56_28 "680pF" CAPC2012X135N 58.166,81.76 r180 top (schematic designator C56)
C56_29 "680pF" CAPC2012X135N 82.966,79.26 r180 top (schematic designator C56)
C56_30 "680pF" CAPC2012X135N 106.166,79.51 r180 top (schematic designator C56)
C56_31 "680pF" CAPC2012X135N 82.966,86.26 r180 top (schematic designator C56)
C56_32 "680pF" CAPC2012X135N 106.166,86.51 r180 top (schematic designator C56)
C61_1 "220pF" CAPC1608X87N 57.912,7.442 r90 top (schematic designator C61)
C61_2 "220pF" CAPC1608X87N 82.712,4.942 r90 top (schematic designator C61)
C61_3 "220pF" CAPC1608X87N 57.912,14.442 r90 top (schematic designator C61)
C61_4 "220pF" CAPC1608X87N 82.712,11.942 r90 top (schematic designator C61)
C61_5 "220pF" CAPC1608X87N 57.912,21.442 r90 top (schematic designator C61)
C61_6 "220pF" CAPC1608X87N 82.712,18.942 r90 top (schematic designator C61)
C61_7 "220pF" CAPC1608X87N 57.912,28.442 r90 top (schematic designator C61)
C61_8 "220pF" CAPC1608X87N 82.712,25.942 r90 top (schematic designator C61)
C61_9 "220pF" CAPC1608X87N 105.912,26.192 r90 top (schematic designator C61)
C61_10 "220pF" CAPC1608X87N 57.912,35.442 r90 top (schematic designator C61)
C61_11 "220pF" CAPC1608X87N 82.712,32.942 r90 top (schematic designator C61)
C61_12 "220pF" CAPC1608X87N 105.912,33.192 r90 top (schematic designator C61)
C61_13 "220pF" CAPC1608X87N 57.912,42.442 r90 top (schematic designator C61)
C61_14 "220pF" CAPC1608X87N 82.712,39.942 r90 top (schematic designator C61)
C61_15 "220pF" CAPC1608X87N 105.912,40.192 r90 top (schematic designator C61)
C61_16 "220pF" CAPC1608X87N 57.912,49.442 r90 top (schematic designator C61)
C61_17 "220pF" CAPC1608X87N 82.712,46.942 r90 top (schematic designator C61)
C61_18 "220pF" CAPC1608X87N 105.912,47.192 r90 top (schematic designator C61)
C61_19 "220pF" CAPC1608X87N 57.912,56.442 r90 top (schematic designator C61)
C61_20 "220pF" CAPC1608X87N 82.712,53.942 r90 top (schematic designator C61)
C61_21 "220pF" CAPC1608X87N 105.912,54.192 r90 top (schematic designator C61)
C61_22 "220pF" CAPC1608X87N 57.912,63.442 r90 top (schematic designator C61)
C61_23 "220pF" CAPC1608X87N 82.712,60.942 r90 top (schematic designator C61)
C61_24 "220pF" CAPC1608X87N 105.912,61.192 r90 top (schematic designator C61)
C61_25 "220pF" CAPC1608X87N 57.912,70.442 r90 top (schematic designator C61)
C61_26 "220pF" CAPC1608X87N 82.712,67.942 r90 top (schematic designator C61)
C61_27 "220pF" CAPC1608X87N 105.912,68.192 r90 top (schematic designator C61)
C61_28 "220pF" CAPC1608X87N 57.912,77.442 r90 top (schematic designator C61)
C61_29 "220pF" CAPC1608X87N 82.712,74.942 r90 top (schematic designator C61)
C61_30 "220pF" CAPC1608X87N 105.912,75.192 r90 top (schematic designator C61)
C61_31 "220pF" CAPC1608X87N 82.712,81.942 r90 top (schematic designator C61)
C61_32 "220pF" CAPC1608X87N 105.912,82.192 r90 top (schematic designator C61)
C62_1 "2.2nF" CAPC3216X140N 44.744,8.688 r270 bottom (schematic designator C62)
C62_2 "2.2nF" CAPC3216X140N 69.544,6.188 r270 bottom (schematic designator C62)
C62_3 "2.2nF" CAPC3216X140N 45.044,15.688 r270 bottom (schematic designator C62)
C62_4 "2.2nF" CAPC3216X140N 69.394,13.238 r270 bottom (schematic designator C62)
C62_5 "2.2nF" CAPC3216X140N 44.844,22.688 r270 bottom (schematic designator C62)
C62_6 "2.2nF" CAPC3216X140N 69.744,20.088 r270 bottom (schematic designator C62)
C62_7 "2.2nF" CAPC3216X140N 44.744,29.688 r270 bottom (schematic designator C62)
C62_8 "2.2nF" CAPC3216X140N 69.503,27.188 r270 bottom (schematic designator C62)
C62_9 "2.2nF" CAPC3216X140N 92.935,27.388 r270 bottom (schematic designator C62)
C62_10 "2.2nF" CAPC3216X140N 44.944,36.588 r270 bottom (schematic designator C62)
C62_11 "2.2nF" CAPC3216X140N 69.694,34.238 r270 bottom (schematic designator C62)
C62_12 "2.2nF" CAPC3216X140N 92.744,34.488 r270 bottom (schematic designator C62)
C62_13 "2.2nF" CAPC3216X140N 44.844,43.788 r270 bottom (schematic designator C62)
C62_14 "2.2nF" CAPC3216X140N 69.844,41.188 r270 bottom (schematic designator C62)
C62_15 "2.2nF" CAPC3216X140N 92.944,41.388 r270 bottom (schematic designator C62)
C62_16 "2.2nF" CAPC3216X140N 44.844,50.688 r270 bottom (schematic designator C62)
C62_17 "2.2nF" CAPC3216X140N 69.544,48.088 r270 bottom (schematic designator C62)
C62_18 "2.2nF" CAPC3216X140N 92.935,48.288 r270 bottom (schematic designator C62)
C62_19 "2.2nF" CAPC3216X140N 44.844,57.688 r270 bottom (schematic designator C62)
C62_20 "2.2nF" CAPC3216X140N 69.644,55.015 r270 bottom (schematic designator C62)
C62_21 "2.2nF" CAPC3216X140N 92.935,55.388 r270 bottom (schematic designator C62)
C62_22 "2.2nF" CAPC3216X140N 44.844,64.488 r270 bottom (schematic designator C62)
C62_23 "2.2nF" CAPC3216X140N 69.344,62.088 r270 bottom (schematic designator C62)
C62_24 "2.2nF" CAPC3216X140N 92.935,62.588 r270 bottom (schematic designator C62)
C62_25 "2.2nF" CAPC3216X140N 44.944,71.688 r270 bottom (schematic designator C62)
C62_26 "2.2nF" CAPC3216X140N 69.444,69.088 r270 bottom (schematic designator C62)
C62_27 "2.2nF" CAPC3216X140N 92.744,69.488 r270 bottom (schematic designator C62)
C62_28 "2.2nF" CAPC3216X140N 45.044,78.688 r270 bottom (schematic designator C62)
C62_29 "2.2nF" CAPC3216X140N 69.644,76.188 r270 bottom (schematic designator C62)
C62_30 "2.2nF" CAPC3216X140N 93.044,76.414 r270 bottom (schematic designator C62)
C62_31 "2.2nF" CAPC3216X140N 69.944,83.188 r270 bottom (schematic designator C62)
C62_32 "2.2nF" CAPC3216X140N 92.844,83.388 r270 bottom (schematic designator C62)
C63 "1uF" CAPC1608X87N 122.252,35.018 r0 bottom
C64 "10nF" CAPC1608X87N 119.64,28.405 r0 top
C68 "82pF" CAPC1608X87N 114.944,19.191 r180 bottom
C69 "100nF" CAPC1005X55N 137.418,20.419 r180 bottom
C70 "100nF" CAPC1005X55N 138.027,25.905 r90 bottom
C71 "82pF" CAPC1608X87N 12.694,-0.012 r0 bottom
C76 "82pF" CAPC1608X87N 12.694,-1.512 r0 bottom
C77 "82pF" CAPC1608X87N 16.444,3.238 r180 bottom
C78 "100nF" CAPC1005X55N 90.947,9.982 r270 bottom
C79 "10uF" CAPMP3216X180N 89.244,12.111 r90 bottom
C80 "2.2uF" CAPC1608X87N 92.344,-1.112 r180 bottom
C81 "2.2uF" CAPC1608X87N 89.144,7.988 r0 bottom
C82 "1uF" CAPC1608X87N 88.444,-1.112 r0 bottom
C83 "100nF" CAPC1005X55N 105.144,12.288 r90 bottom
C90_1 "10uF" CAPMP3216X180N 52.07,8.458 r270 bottom (schematic designator C90)
C90_2 "10uF" CAPMP3216X180N 76.87,5.958 r270 bottom (schematic designator C90)
C90_3 "10uF" CAPMP3216X180N 52.07,15.458 r270 bottom (schematic designator C90)
C90_4 "10uF" CAPMP3216X180N 76.87,12.958 r270 bottom (schematic designator C90)
C90_5 "10uF" CAPMP3216X180N 52.07,22.458 r270 bottom (schematic designator C90)
C90_6 "10uF" CAPMP3216X180N 76.87,19.958 r270 bottom (schematic designator C90)
C90_7 "10uF" CAPMP3216X180N 52.07,29.458 r270 bottom (schematic designator C90)
C90_8 "10uF" CAPMP3216X180N 76.87,26.958 r270 bottom (schematic designator C90)
C90_9 "10uF" CAPMP3216X180N 100.07,27.208 r270 bottom (schematic designator C90)
C90_10 "10uF" CAPMP3216X180N 52.07,36.458 r270 bottom (schematic designator C90)
C90_11 "10uF" CAPMP3216X180N 76.87,33.958 r270 bottom (schematic designator C90)
C90_12 "10uF" CAPMP3216X180N 100.07,34.208 r270 bottom (schematic designator C90)
C90_13 "10uF" CAPMP3216X180N 52.07,43.458 r270 bottom (schematic designator C90)
C90_14 "10uF" CAPMP3216X180N 76.87,40.958 r270 bottom (schematic designator C90)
C90_15 "10uF" CAPMP3216X180N 100.07,41.208 r270 bottom (schematic designator C90)
C90_16 "10uF" CAPMP3216X180N 52.07,50.458 r270 bottom (schematic designator C90)
C90_17 "10uF" CAPMP3216X180N 76.87,47.958 r270 bottom (schematic designator C90)
C90_18 "10uF" CAPMP3216X180N 100.07,48.208 r270 bottom (schematic designator C90)
C90_19 "10uF" CAPMP3216X180N 52.07,57.458 r270 bottom (schematic designator C90)
C90_20 "10uF" CAPMP3216X180N 76.87,54.958 r270 bottom (schematic designator C90)
C90_21 "10uF" CAPMP3216X180N 100.07,55.208 r270 bottom (schematic designator C90)
C90_22 "10uF" CAPMP3216X180N 52.07,64.458 r270 bottom (schematic designator C90)
C90_23 "10uF" CAPMP3216X180N 76.87,61.958 r270 bottom (schematic designator C90)
C90_24 "10uF" CAPMP3216X180N 100.07,62.208 r270 bottom (schematic designator C90)
C90_25 "10uF" CAPMP3216X180N 52.07,71.458 r270 bottom (schematic designator C90)
C90_26 "10uF" CAPMP3216X180N 76.87,68.958 r270 bottom (schematic designator C90)
C90_27 "10uF" CAPMP3216X180N 100.07,69.208 r270 bottom (schematic designator C90)
C90_28 "10uF" CAPMP3216X180N 52.07,78.458 r270 bottom (schematic designator C90)
C90_29 "10uF" CAPMP3216X180N 76.87,75.958 r270 bottom (schematic designator C90)
C90_30 "10uF" CAPMP3216X180N 100.07,76.208 r270 bottom (schematic designator C90)
C90_31 "10uF" CAPMP3216X180N 76.87,82.958 r270 bottom (schematic designator C90)
C90_32 "10uF" CAPMP3216X180N 100.07,83.208 r270 bottom (schematic designator C90)
C91_1 "100nF" CAPC1005X55N 50.292,7.188 r90 bottom (schematic designator C91)
C91_2 "100nF" CAPC1005X55N 75.092,4.688 r90 bottom (schematic designator C91)
C91_3 "100nF" CAPC1005X55N 50.292,14.188 r90 bottom (schematic designator C91)
C91_4 "100nF" CAPC1005X55N 75.092,11.688 r90 bottom (schematic designator C91)
C91_5 "100nF" CAPC1005X55N 50.292,21.188 r90 bottom (schematic designator C91)
C91_6 "100nF" CAPC1005X55N 75.092,18.688 r90 bottom (schematic designator C91)
C91_7 "100nF" CAPC1005X55N 50.292,28.188 r90 bottom (schematic designator C91)
C91_8 "100nF" CAPC1005X55N 75.092,25.688 r90 bottom (schematic designator C91)
C91_9 "100nF" CAPC1005X55N 98.292,25.938 r90 bottom (schematic designator C91)
C91_10 "100nF" CAPC1005X55N 50.292,35.188 r90 bottom (schematic designator C91)
C91_11 "100nF" CAPC1005X55N 75.092,32.688 r90 bottom (schematic designator C91)
C91_12 "100nF" CAPC1005X55N 98.292,32.938 r90 bottom (schematic designator C91)
C91_13 "100nF" CAPC1005X55N 50.292,42.188 r90 bottom (schematic designator C91)
C91_14 "100nF" CAPC1005X55N 75.092,39.688 r90 bottom (schematic designator C91)
C91_15 "100nF" CAPC1005X55N 98.292,39.938 r90 bottom (schematic designator C91)
C91_16 "100nF" CAPC1005X55N 50.292,49.188 r90 bottom (schematic designator C91)
C91_17 "100nF" CAPC1005X55N 75.092,46.688 r90 bottom (schematic designator C91)
C91_18 "100nF" CAPC1005X55N 98.292,46.938 r90 bottom (schematic designator C91)
C91_19 "100nF" CAPC1005X55N 50.292,56.188 r90 bottom (schematic designator C91)
C91_20 "100nF" CAPC1005X55N 75.092,53.688 r90 bottom (schematic designator C91)
C91_21 "100nF" CAPC1005X55N 98.292,53.938 r90 bottom (schematic designator C91)
C91_22 "100nF" CAPC1005X55N 50.292,63.188 r90 bottom (schematic designator C91)
C91_23 "100nF" CAPC1005X55N 75.092,60.688 r90 bottom (schematic designator C91)
C91_24 "100nF" CAPC1005X55N 98.292,60.938 r90 bottom (schematic designator C91)
C91_25 "100nF" CAPC1005X55N 50.292,70.188 r90 bottom (schematic designator C91)
C91_26 "100nF" CAPC1005X55N 75.092,67.688 r90 bottom (schematic designator C91)
C91_27 "100nF" CAPC1005X55N 98.292,67.938 r90 bottom (schematic designator C91)
C91_28 "100nF" CAPC1005X55N 50.292,77.188 r90 bottom (schematic designator C91)
C91_29 "100nF" CAPC1005X55N 75.092,74.688 r90 bottom (schematic designator C91)
C91_30 "100nF" CAPC1005X55N 98.292,74.938 r90 bottom (schematic designator C91)
C91_31 "100nF" CAPC1005X55N 75.092,81.688 r90 bottom (schematic designator C91)
C91_32 "100nF" CAPC1005X55N 98.292,81.938 r90 bottom (schematic designator C91)
C92_1 "100nF" CAPC1005X55N 55.88,8.204 r90 bottom (schematic designator C92)
C92_2 "100nF" CAPC1005X55N 80.68,5.704 r90 bottom (schematic designator C92)
C92_3 "100nF" CAPC1005X55N 55.88,15.204 r90 bottom (schematic designator C92)
C92_4 "100nF" CAPC1005X55N 80.68,12.704 r90 bottom (schematic designator C92)
C92_5 "100nF" CAPC1005X55N 55.88,22.204 r90 bottom (schematic designator C92)
C92_6 "100nF" CAPC1005X55N 80.68,19.704 r90 bottom (schematic designator C92)
C92_7 "100nF" CAPC1005X55N 55.88,29.204 r90 bottom (schematic designator C92)
C92_8 "100nF" CAPC1005X55N 80.68,26.704 r90 bottom (schematic designator C92)
C92_9 "100nF" CAPC1005X55N 103.88,26.954 r90 bottom (schematic designator C92)
C92_10 "100nF" CAPC1005X55N 55.88,36.204 r90 bottom (schematic designator C92)
C92_11 "100nF" CAPC1005X55N 80.68,33.704 r90 bottom (schematic designator C92)
C92_12 "100nF" CAPC1005X55N 103.88,33.954 r90 bottom (schematic designator C92)
C92_13 "100nF" CAPC1005X55N 55.88,43.204 r90 bottom (schematic designator C92)
C92_14 "100nF" CAPC1005X55N 80.68,40.704 r90 bottom (schematic designator C92)
C92_15 "100nF" CAPC1005X55N 103.88,40.954 r90 bottom (schematic designator C92)
C92_16 "100nF" CAPC1005X55N 55.88,50.204 r90 bottom (schematic designator C92)
C92_17 "100nF" CAPC1005X55N 80.68,47.704 r90 bottom (schematic designator C92)
C92_18 "100nF" CAPC1005X55N 103.88,47.954 r90 bottom (schematic designator C92)
C92_19 "100nF" CAPC1005X55N 55.88,57.204 r90 bottom (schematic designator C92)
C92_20 "100nF" CAPC1005X55N 80.68,54.704 r90 bottom (schematic designator C92)
C92_21 "100nF" CAPC1005X55N 103.88,54.954 r90 bottom (schematic designator C92)
C92_22 "100nF" CAPC1005X55N 55.88,64.204 r90 bottom (schematic designator C92)
C92_23 "100nF" CAPC1005X55N 80.68,61.704 r90 bottom (schematic designator C92)
C92_24 "100nF" CAPC1005X55N 103.88,61.954 r90 bottom (schematic designator C92)
C92_25 "100nF" CAPC1005X55N 55.88,71.204 r90 bottom (schematic designator C92)
C92_26 "100nF" CAPC1005X55N 80.68,68.704 r90 bottom (schematic designator C92)
C92_27 "100nF" CAPC1005X55N 103.88,68.954 r90 bottom (schematic designator C92)
C92_28 "100nF" CAPC1005X55N 55.88,78.204 r90 bottom (schematic designator C92)
C92_29 "100nF" CAPC1005X55N 80.68,75.704 r90 bottom (schematic designator C92)
C92_30 "100nF" CAPC1005X55N 103.88,75.954 r90 bottom (schematic designator C92)
C92_31 "100nF" CAPC1005X55N 80.68,82.704 r90 bottom (schematic designator C92)
C92_32 "100nF" CAPC1005X55N 103.88,82.954 r90 bottom (schematic designator C92)
C93_1 "10uF" CAPMP3216X180N 57.658,10.744 r180 bottom (schematic designator C93)
C93_2 "10uF" CAPMP3216X180N 82.458,8.244 r180 bottom (schematic designator C93)
C93_3 "10uF" CAPMP3216X180N 57.658,17.744 r180 bottom (schematic designator C93)
C93_4 "10uF" CAPMP3216X180N 82.458,15.244 r180 bottom (schematic designator C93)
C93_5 "10uF" CAPMP3216X180N 57.658,24.744 r180 bottom (schematic designator C93)
C93_6 "10uF" CAPMP3216X180N 82.458,22.244 r180 bottom (schematic designator C93)
C93_7 "10uF" CAPMP3216X180N 57.658,31.744 r180 bottom (schematic designator C93)
C93_8 "10uF" CAPMP3216X180N 82.458,29.244 r180 bottom (schematic designator C93)
C93_9 "10uF" CAPMP3216X180N 105.658,29.494 r180 bottom (schematic designator C93)
C93_10 "10uF" CAPMP3216X180N 57.658,38.744 r180 bottom (schematic designator C93)
C93_11 "10uF" CAPMP3216X180N 82.458,36.244 r180 bottom (schematic designator C93)
C93_12 "10uF" CAPMP3216X180N 105.658,36.494 r180 bottom (schematic designator C93)
C93_13 "10uF" CAPMP3216X180N 57.658,45.744 r180 bottom (schematic designator C93)
C93_14 "10uF" CAPMP3216X180N 82.458,43.244 r180 bottom (schematic designator C93)
C93_15 "10uF" CAPMP3216X180N 105.658,43.494 r180 bottom (schematic designator C93)
C93_16 "10uF" CAPMP3216X180N 57.658,52.744 r180 bottom (schematic designator C93)
C93_17 "10uF" CAPMP3216X180N 82.458,50.244 r180 bottom (schematic designator C93)
C93_18 "10uF" CAPMP3216X180N 105.658,50.494 r180 bottom (schematic designator C93)
C93_19 "10uF" CAPMP3216X180N 57.658,59.744 r180 bottom (schematic designator C93)
C93_20 "10uF" CAPMP3216X180N 82.458,57.244 r180 bottom (schematic designator C93)
C93_21 "10uF" CAPMP3216X180N 105.658,57.494 r180 bottom (schematic designator C93)
C93_22 "10uF" CAPMP3216X180N 57.658,66.744 r180 bottom (schematic designator C93)
C93_23 "10uF" CAPMP3216X180N 82.458,64.244 r180 bottom (schematic designator C93)
C93_24 "10uF" CAPMP3216X180N 105.658,64.494 r180 bottom (schematic designator C93)
C93_25 "10uF" CAPMP3216X180N 57.658,73.744 r180 bottom (schematic designator C93)
C93_26 "10uF" CAPMP3216X180N 82.458,71.244 r180 bottom (schematic designator C93)
C93_27 "10uF" CAPMP3216X180N 105.658,71.494 r180 bottom (schematic designator C93)
C93_28 "10uF" CAPMP3216X180N 57.658,80.744 r180 bottom (schematic designator C93)
C93_29 "10uF" CAPMP3216X180N 82.458,78.244 r180 bottom (schematic designator C93)
C93_30 "10uF" CAPMP3216X180N 105.658,78.494 r180 bottom (schematic designator C93)
C93_31 "10uF" CAPMP3216X180N 82.458,85.244 r180 bottom (schematic designator C93)
C93_32 "10uF" CAPMP3216X180N 105.658,85.494 r180 bottom (schematic designator C93)
C95 "82pF" CAPC1608X87N 114.944,17.688 r180 bottom
C96 "1uF" CAPC1608X87N 19.402,2.867 r180 top
C124 "10uF" CAPMP3216X180N 119.357,36.194 r270 bottom
C129 "22uF" CAPC2012X135N 122.332,68.708 r90 top
C130 "22uF" CAPC2012X135N 136.906,77.546 r180 bottom
C131 "22uF" CAPC2012X135N 127.225,75.511 r180 bottom
C132 "10uF" CAPMP3216X180N 127.733,77.67 r0 bottom
C133 "1uF" CAPC1608X87N 125.178,32.599 r90 top
C134 "10uF" CAPMP3216X180N 122.78,75.638 r180 bottom
C136 "10uF" CAPMP3216X180N 136.574,62.729 r0 bottom
C137 "22uF" CAPC2012X135N 136.074,54.229 r180 bottom
C138 "22uF" CAPC2012X135N 136.074,60.229 r180 bottom
C139 "22uF" CAPC2012X135N 136.074,58.229 r180 bottom
C140 "22uF" CAPC2012X135N 136.074,56.229 r180 bottom
C141 "22uF" CAPC2012X135N 144.272,77.546 r0 bottom
C142 "22uF" CAPC2012X135N 119.044,87.46 r180 bottom
C144 "1uF" CAPC1608X87N 122.944,43.588 r90 top
C147 "10uF" CAPMP3216X180N 118.118,44.832 r270 bottom
C148 "100nF" CAPC1005X55N 127.032,57.519 r270 top
C149 "22uF" CAPC2012X135N 121.532,58.019 r270 top
C150 "100nF" CAPC1005X55N 125.032,60.519 r180 top
C151 "22uF" CAPC2012X135N 125.694,61.988 r180 top
CLIP28 "S1411-46R" CLIP_HOLLAND-SHIELDING_LC 112.707,27.019 r90 top
CLIP29 "S1411-46R" CLIP_HOLLAND-SHIELDING_LC 112.707,47.019 r90 top
CLIP30 "S1411-46R" CLIP_HOLLAND-SHIELDING_LC 112.707,64.519 r90 top
CLIP31 "S1411-46R" CLIP_HOLLAND-SHIELDING_LC 112.707,82.019 r90 top
CLIP32 "S1411-46R" CLIP_HOLLAND-SHIELDING_LC 85.207,-0.481 r180 top
CLIP33 "S1411-46R" CLIP_HOLLAND-SHIELDING_LC 85.207,89.519 r180 top
CLIP34 "S1411-46R" CLIP_HOLLAND-SHIELDING_LC 105.207,89.519 r180 top
CLIP37 "S1411-46R" CLIP_HOLLAND-SHIELDING_LC 112.707,7.019 r90 top
CLIP38 "S1411-46R" CLIP_HOLLAND-SHIELDING_LC 37.707,82.019 r90 top
CLIP39 "S1411-46R" CLIP_HOLLAND-SHIELDING_LC 37.707,64.519 r90 top
CLIP40 "S1411-46R" CLIP_HOLLAND-SHIELDING_LC 37.707,47.019 r90 top
CLIP41 "S1411-46R" CLIP_HOLLAND-SHIELDING_LC 45.207,89.519 r180 top
CLIP42 "S1411-46R" CLIP_HOLLAND-SHIELDING_LC 65.207,89.519 r180 top
CLIP43 "S1411-46R" CLIP_HOLLAND-SHIELDING_LC 45.207,-0.481 r180 top
CLIP44 "S1411-46R" CLIP_HOLLAND-SHIELDING_LC 65.207,-0.481 r180 top
CLIP45 "S1411-46R" CLIP_HOLLAND-SHIELDING_LC 105.207,-0.481 r180 top
CLIP46 "S1411-46R" CLIP_HOLLAND-SHIELDING_LC 37.707,7.019 r90 top
CLIP47 "S1411-46R" CLIP_HOLLAND-SHIELDING_LC 37.707,27.019 r90 top
D1 "SK26A" DIOM5126X265N 45.944,86.043 r180 top
D2 "SK26A" DIOM5126X265N 47.093,3.123 r0 top
D3 "PRTR5V0U2X" SOT190P230X110-4N 149.327,6.029 r180 top
D5_1 "BAV199" SOT95P240X110-3N 41.144,8.369 r0 bottom (schematic designator D5)
D5_2 "BAV199" SOT95P240X110-3N 65.744,5.419 r0 bottom (schematic designator D5)
D5_3 "BAV199" SOT95P240X110-3N 41.144,15.188 r0 bottom (schematic designator D5)
D5_4 "BAV199" SOT95P240X110-3N 65.544,12.388 r0 bottom (schematic designator D5)
D5_5 "BAV199" SOT95P240X110-3N 41.044,22.188 r0 bottom (schematic designator D5)
D5_6 "BAV199" SOT95P240X110-3N 65.46,19.369 r0 bottom (schematic designator D5)
D5_7 "BAV199" SOT95P240X110-3N 41.044,28.888 r0 bottom (schematic designator D5)
D5_8 "BAV199" SOT95P240X110-3N 65.649,26.388 r0 bottom (schematic designator D5)
D5_9 "BAV199" SOT95P240X110-3N 88.999,26.788 r0 bottom (schematic designator D5)
D5_10 "BAV199" SOT95P240X110-3N 41.044,36.188 r0 bottom (schematic designator D5)
D5_11 "BAV199" SOT95P240X110-3N 65.744,33.388 r0 bottom (schematic designator D5)
D5_12 "BAV199" SOT95P240X110-3N 88.944,33.733 r0 bottom (schematic designator D5)
D5_13 "BAV199" SOT95P240X110-3N 41.044,43.188 r0 bottom (schematic designator D5)
D5_14 "BAV199" SOT95P240X110-3N 65.649,40.388 r0 bottom (schematic designator D5)
D5_15 "BAV199" SOT95P240X110-3N 89.025,40.788 r0 bottom (schematic designator D5)
D5_16 "BAV199" SOT95P240X110-3N 41.044,50.188 r0 bottom (schematic designator D5)
D5_17 "BAV199" SOT95P240X110-3N 65.644,47.288 r0 bottom (schematic designator D5)
D5_18 "BAV199" SOT95P240X110-3N 89.044,47.788 r0 bottom (schematic designator D5)
D5_19 "BAV199" SOT95P240X110-3N 41.144,57.288 r0 bottom (schematic designator D5)
D5_20 "BAV199" SOT95P240X110-3N 65.744,54.288 r0 bottom (schematic designator D5)
D5_21 "BAV199" SOT95P240X110-3N 89.044,54.688 r0 bottom (schematic designator D5)
D5_22 "BAV199" SOT95P240X110-3N 41.044,64.188 r0 bottom (schematic designator D5)
D5_23 "BAV199" SOT95P240X110-3N 65.744,61.488 r0 bottom (schematic designator D5)
D5_24 "BAV199" SOT95P240X110-3N 89.044,61.688 r0 bottom (schematic designator D5)
D5_25 "BAV199" SOT95P240X110-3N 40.944,71.188 r0 bottom (schematic designator D5)
D5_26 "BAV199" SOT95P240X110-3N 65.644,68.388 r0 bottom (schematic designator D5)
D5_27 "BAV199" SOT95P240X110-3N 89.144,68.824 r0 bottom (schematic designator D5)
D5_28 "BAV199" SOT95P240X110-3N 40.944,78.188 r0 bottom (schematic designator D5)
D5_29 "BAV199" SOT95P240X110-3N 65.844,75.288 r0 bottom (schematic designator D5)
D5_30 "BAV199" SOT95P240X110-3N 89.144,75.688 r0 bottom (schematic designator D5)
D5_31 "BAV199" SOT95P240X110-3N 65.749,82.488 r0 bottom (schematic designator D5)
D5_32 "BAV199" SOT95P240X110-3N 88.944,82.688 r0 bottom (schematic designator D5)
FTG1 "Use only in PCB" FIDUCIAL_TOP_C100-200 147.726,89.383 r270 bottom
FTG2 "Use only in PCB" FIDUCIAL_TOP_C100-200 147.726,89.383 r270 top
FTG3 "Use only in PCB" FIDUCIAL_TOP_S100-200 10.49,89.488 r270 bottom
FTG4 "Use only in PCB" FIDUCIAL_TOP_S100-200 147.65,0.015 r270 bottom
FTG5 "Use only in PCB" FIDUCIAL_TOP_S100-200 147.65,0.015 r270 top
FTG6 "Use only in PCB" FIDUCIAL_TOP_S100-200 10.49,89.488 r270 top
HS1 "Heat Sink No Pad" HSINK_ATS_ATS-56001-C3-R0 98.176,12.738 r180 top locked
IC1 "CC6-1212DF-E" CC6-1212DF-E 130.302,59.766 r90 top locked
IC2_1 "OPA197ID" SOIC127P600X175-8N 53.051,8.458 r180 top (schematic designator IC2)
IC2_2 "OPA197ID" SOIC127P600X175-8N 77.851,5.958 r180 top (schematic designator IC2)
IC2_3 "OPA197ID" SOIC127P600X175-8N 53.051,15.458 r180 top (schematic designator IC2)
IC2_4 "OPA197ID" SOIC127P600X175-8N 77.851,12.958 r180 top (schematic designator IC2)